# Altium PCB DSP_Expansion_Board.PcbDoc (part 1 of 3)
Units mil, origin at the board's own origin, x right, y up, seen from the top; angles counter-clockwise.
Board outline 7913.39 x 4448.82 mil, 4 copper layers (Top Layer, GND, inner signal, Bottom Layer), stack 23.78 mil thick; 392 components, 294 nets, 1167 pads, 457 vias.
Unrouted connection lines stored in the file: 108.
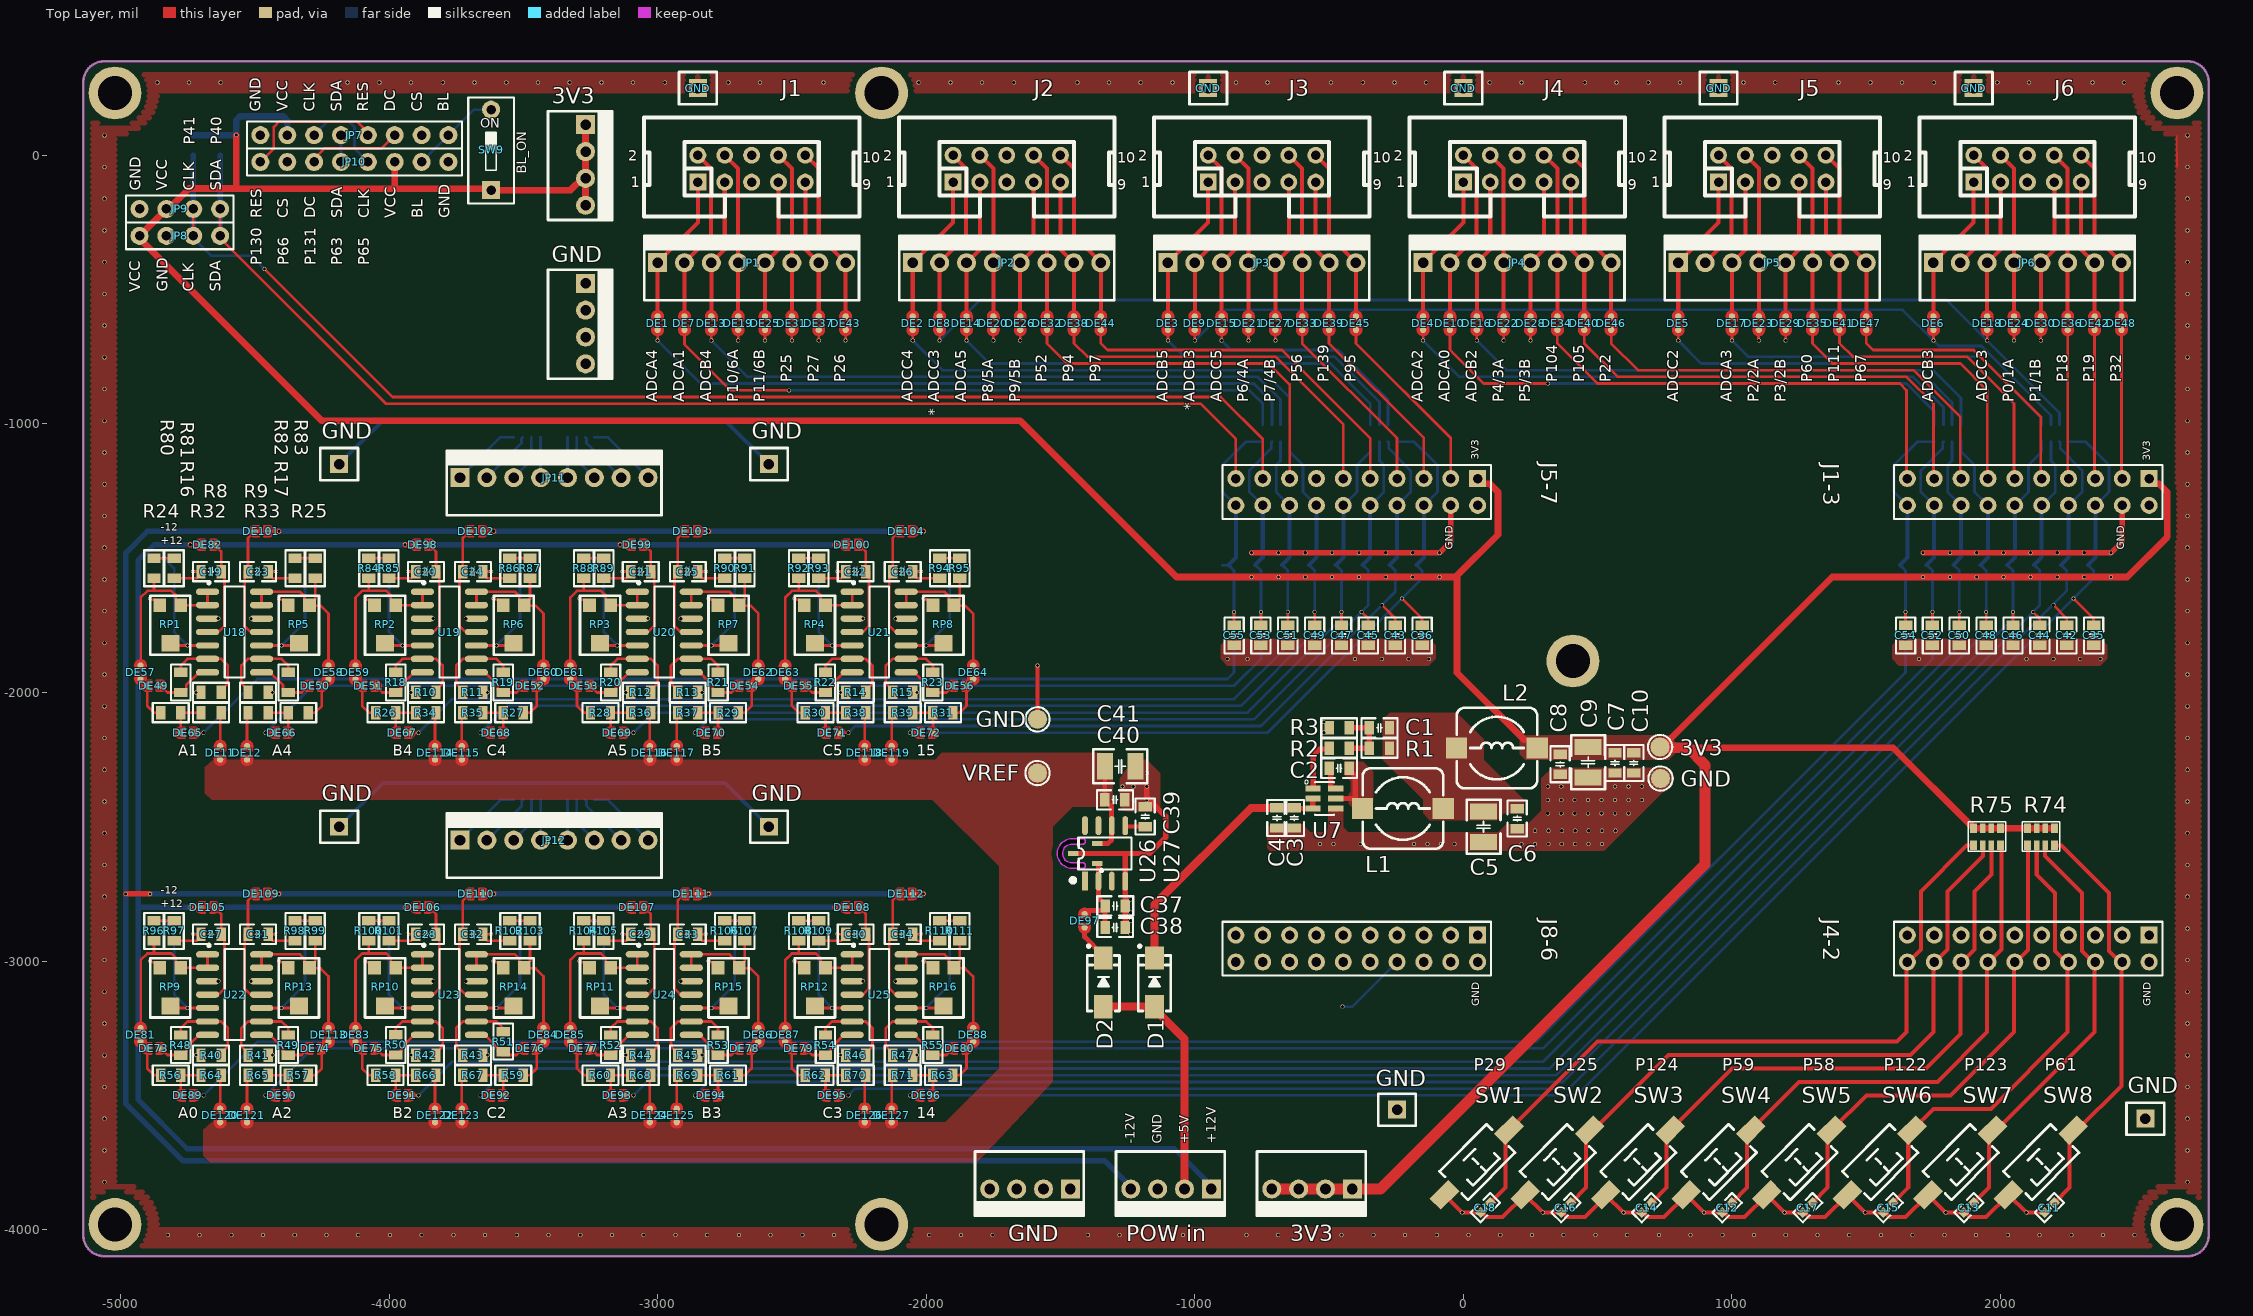
[diagram p0: Top Layer view]
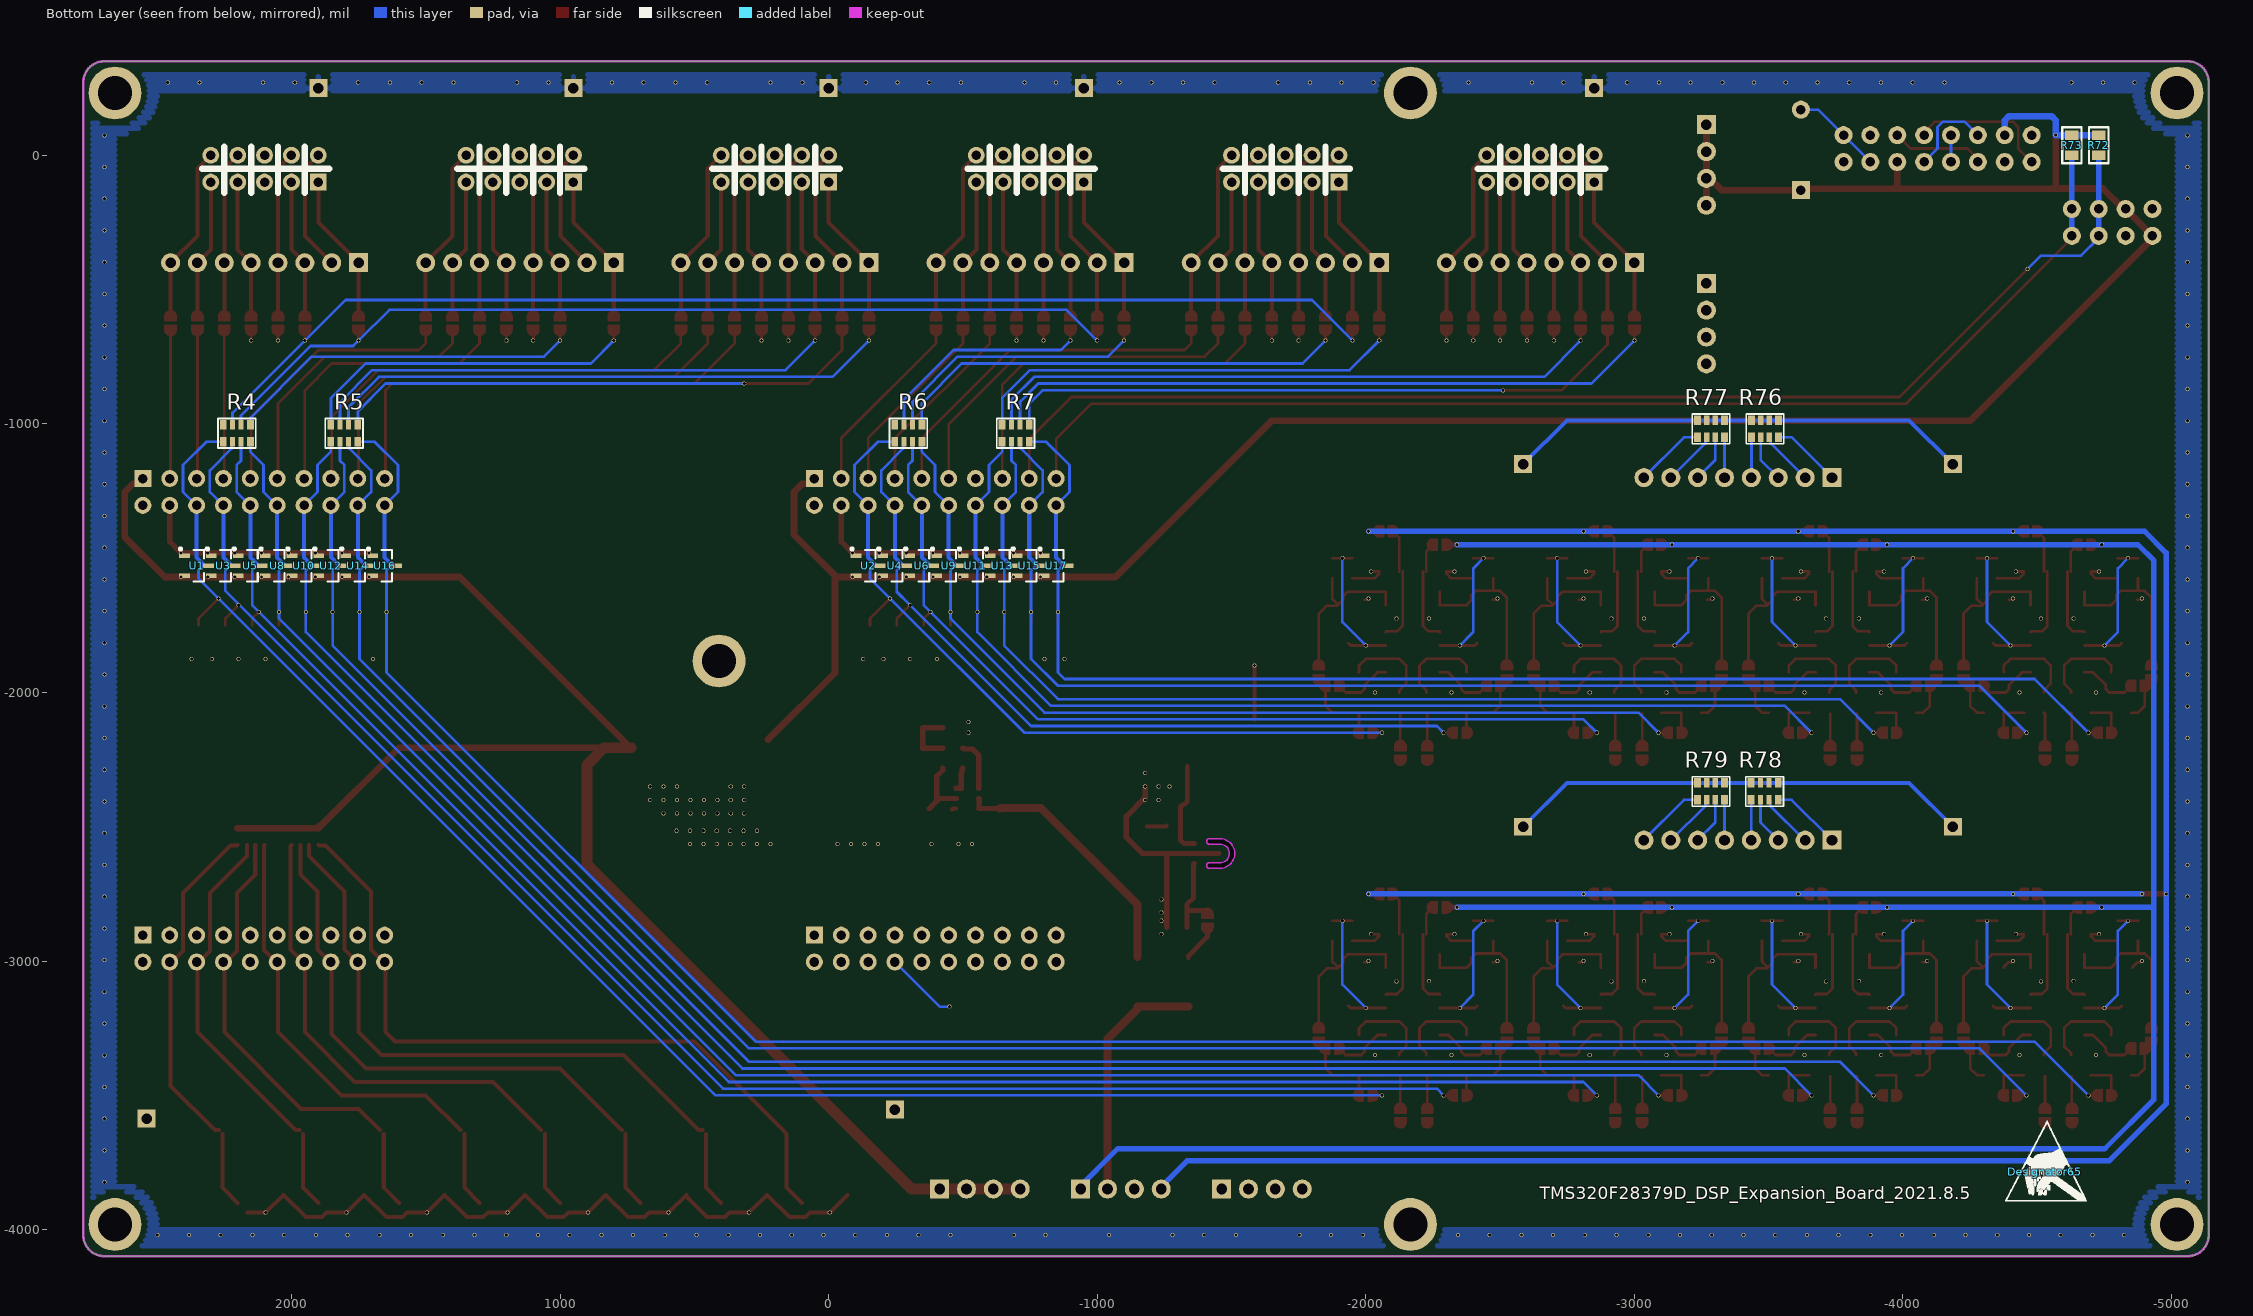
[diagram p1: Bottom Layer view, seen from below]
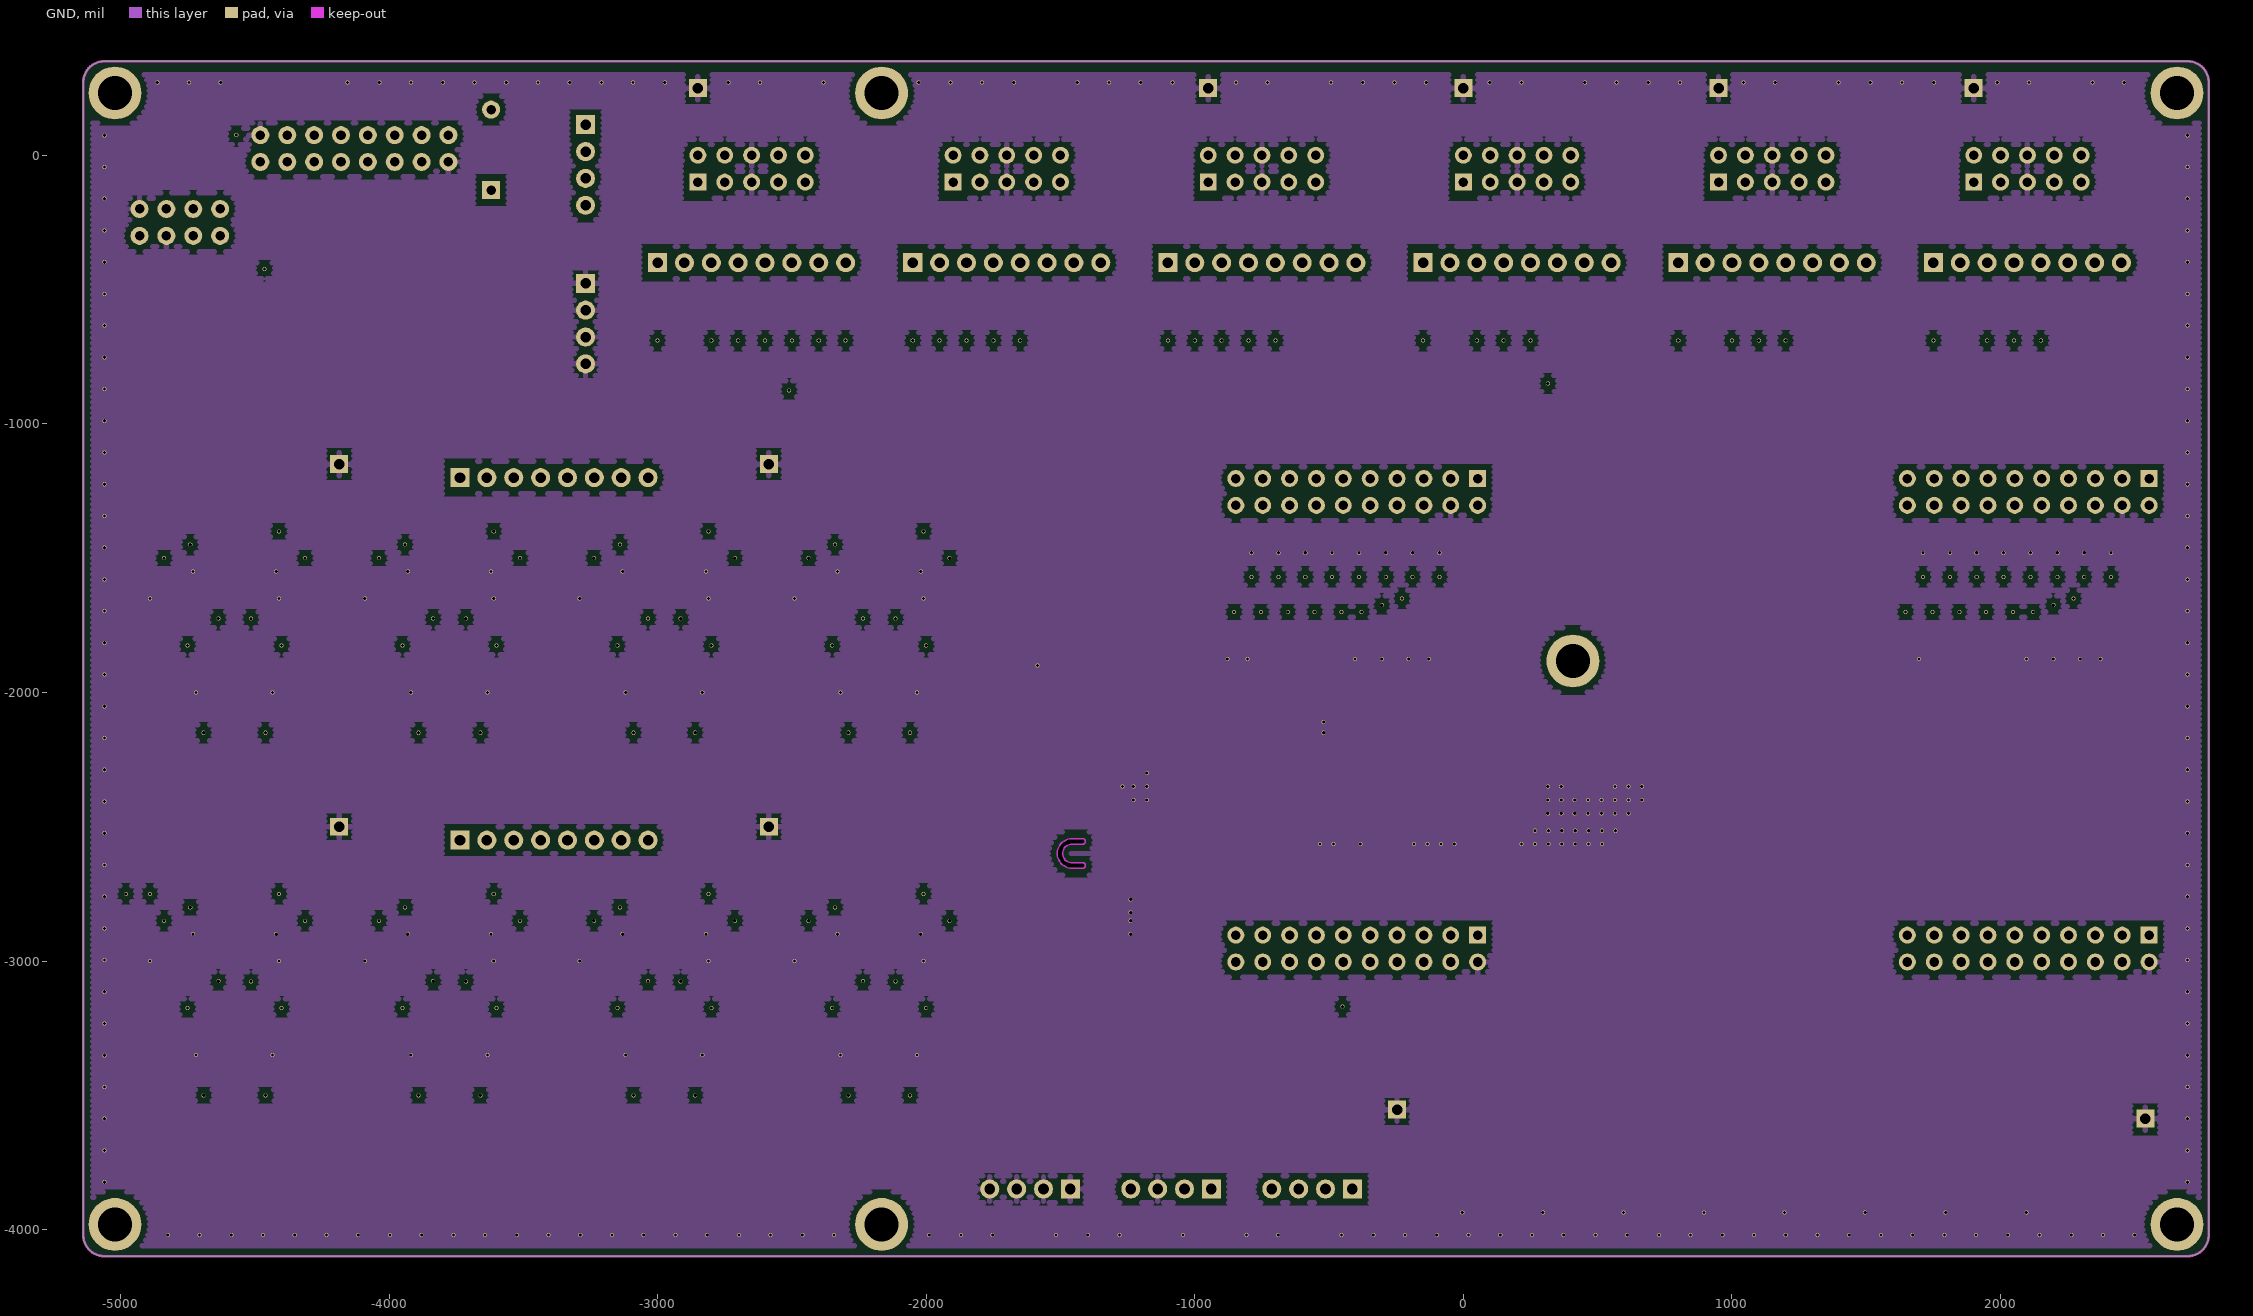
[diagram p2: GND]
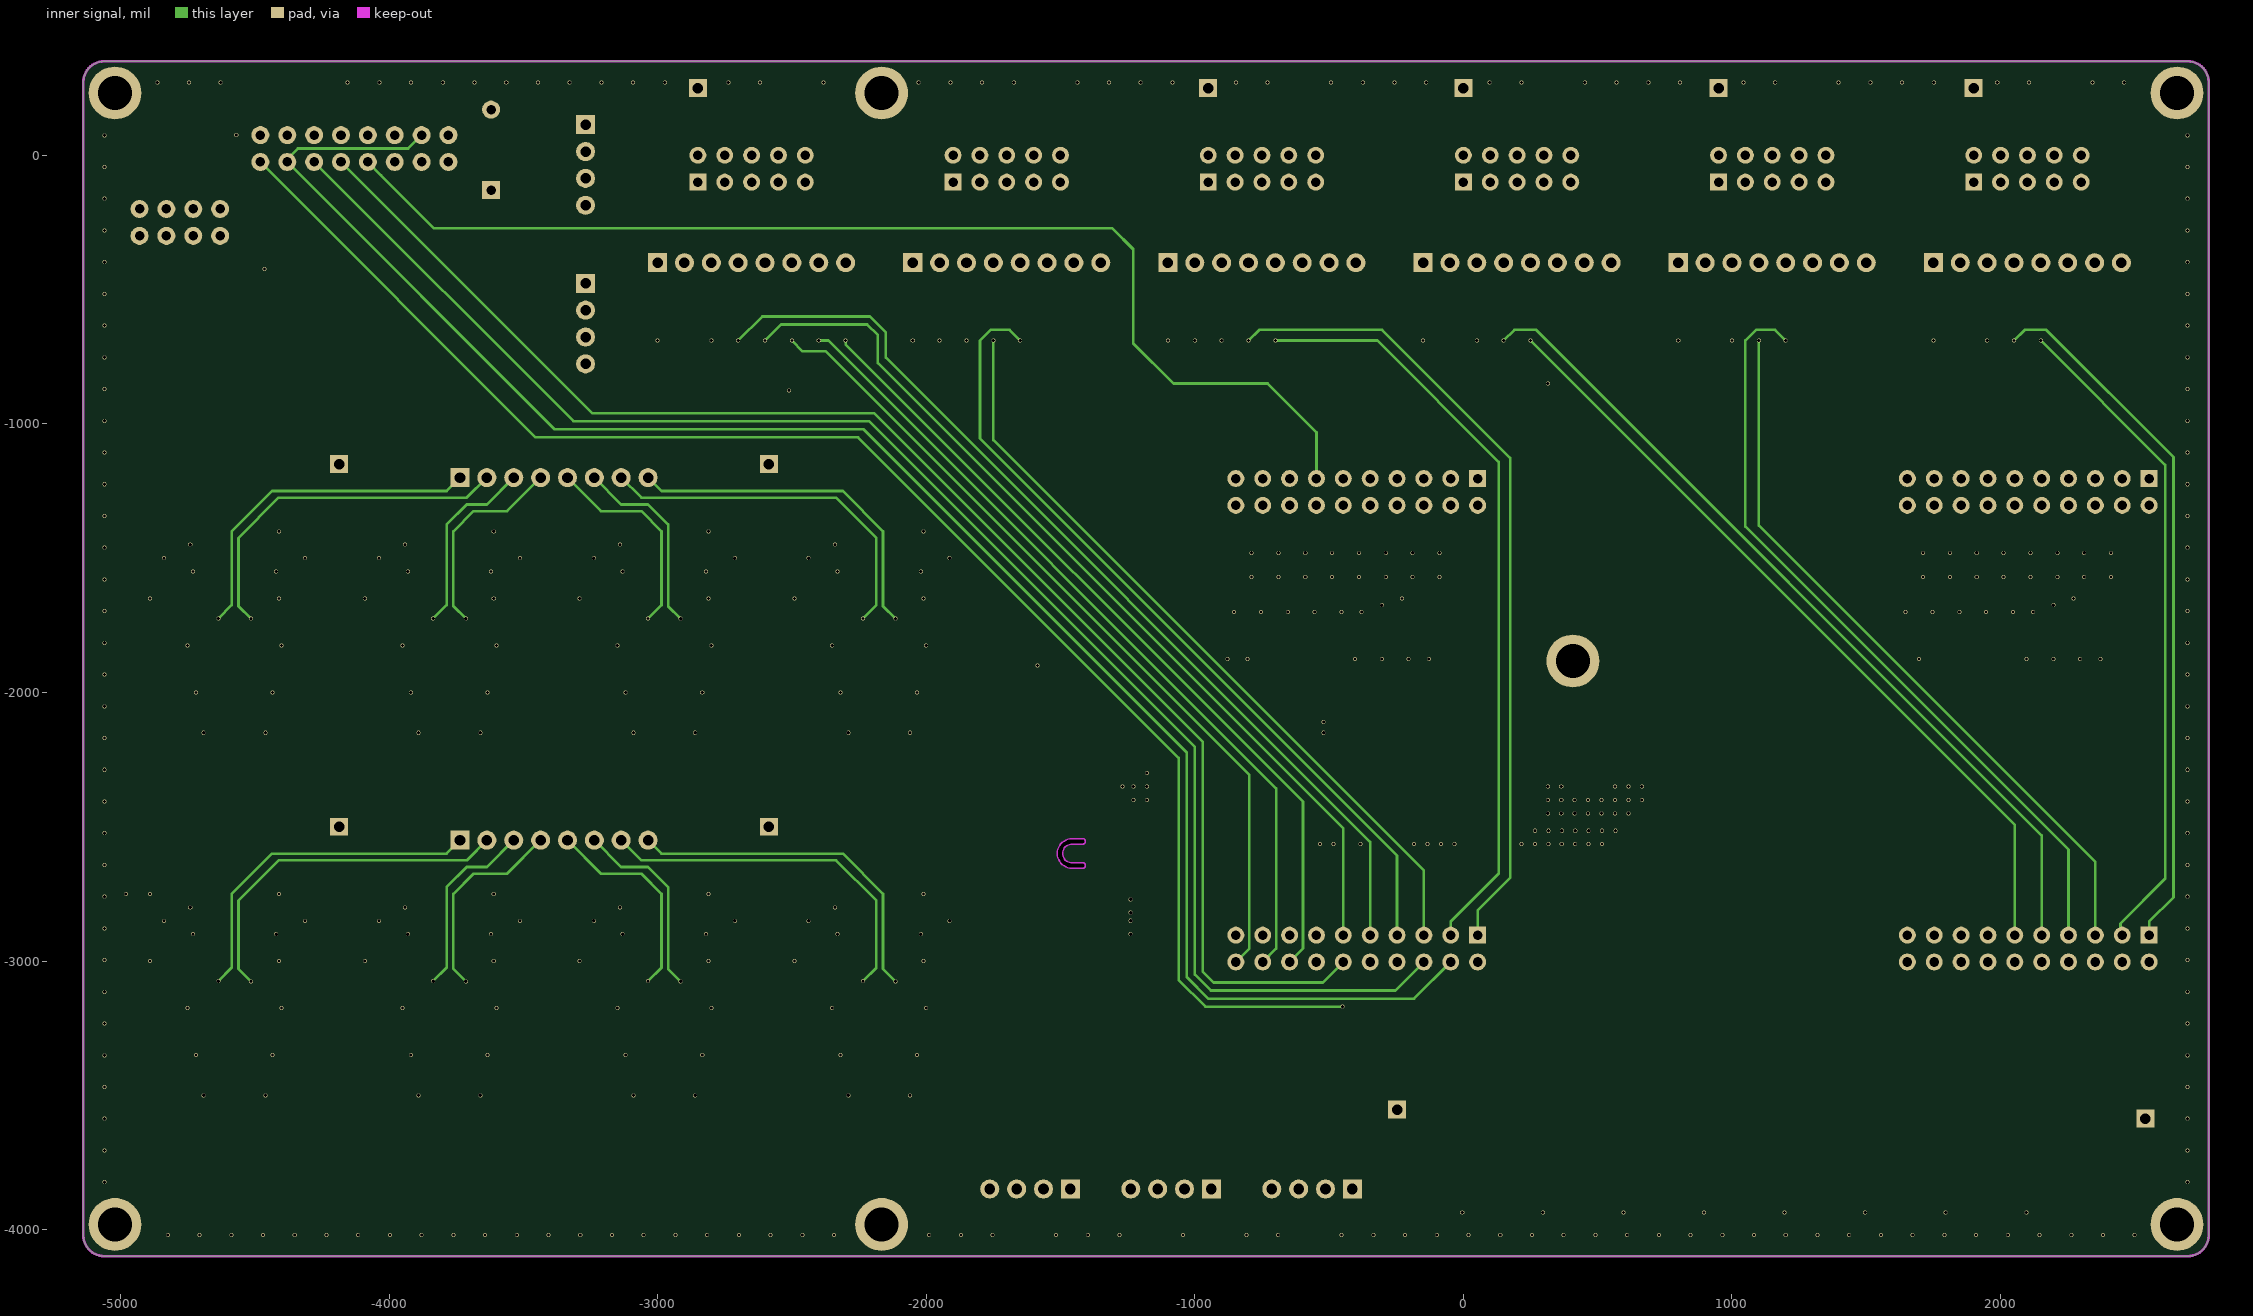
[diagram p3: inner signal]

## Layer stack, top to bottom
Top Solder: solder mask 0.3937, Solder Resist, Dk 3.5
Top Layer: signal copper 1.4173
Dielectric 2: prepreg 2.7953, PP-006, Dk 4.1
GND: signal copper 1.378
Dielectric 1: dielectric 12.5984, FR-4, Dk 4.8
inner signal: signal copper 1.378
Dielectric 3: prepreg 2.7953, PP-006, Dk 4.1
Bottom Layer: signal copper 1.4173
Bottom Solder: solder mask 0.3937, Solder Resist, Dk 3.5

## Board outline
-5059.59,-4098.82 cw(c-5059.59,-4020.08) -5138.33,-4020.08 -5138.33,271.26 cw(c-5059.59,271.26) -5059.59,350 2696.31,350 cw(c2696.31,271.26) 2775.05,271.26 2775.05,-4020.08 cw(c2696.31,-4020.08) 2696.31,-4098.82
cut-out: -1511.93,-2599.41 ccw(c-1456.93,-2599.41) -1456.93,-2654.41 -1416.93,-2654.41 ccw(c-1416.93,-2644.41) -1406.93,-2644.41 ccw(c-1416.93,-2644.41) -1416.93,-2634.41 -1456.93,-2634.41 cw(c-1456.93,-2599.41) -1491.93,-2599.41 cw(c-1456.93,-2599.41) -1456.93,-2564.41 -1416.93,-2564.41 ccw(c-1416.93,-2554.41) -1406.93,-2554.41 ccw(c-1416.93,-2554.41) -1416.93,-2544.41 -1456.93,-2544.41 ccw(c-1456.93,-2599.41)

## Design rules (kind name [scope] priority, off if disabled: settings)
Clearance Clearance_3 [All] p1: gap=10 ignorepadtopadclearanceinfootprint=TRUE except(0: Arc-Hole Track-Hole SMDPad-Hole THPad-Hole Via-Hole Text-Hole; 20: Arc-Fill Arc-Poly Track-Fill Track-Poly SMDPad-Fill SMDPad-Poly THPad-Fill THPad-Poly Via-Fill Via-Poly Fill-Fill Fill-Poly Fill-Text Fill-Hole Poly-Poly Poly-Text Poly-Hole)
Clearance Clearance_2 [All] p2: gap=20 ignorepadtopadclearanceinfootprint=TRUE except(0: Arc-Hole Track-Hole SMDPad-Hole THPad-Hole Via-Hole Text-Hole; 10: Arc-Arc Arc-Track Arc-SMDPad Arc-THPad Arc-Via Arc-Text Track-Track Track-SMDPad Track-THPad Track-Via Track-Text SMDPad-SMDPad SMDPad-THPad SMDPad-Via SMDPad-Text THPad-THPad THPad-Via THPad-Text Via-Via Via-Text Text-Text)
Clearance Clearance_1 [OnLayer('GND')] p3: gap=10 ignorepadtopadclearanceinfootprint=TRUE except(0: Arc-Hole Track-Hole SMDPad-Hole THPad-Hole Via-Hole Fill-Hole Poly-Hole Region-Hole Text-Hole; 20: Arc-Fill Arc-Poly Track-Fill Track-Poly SMDPad-Fill SMDPad-Poly THPad-Fill THPad-Poly Via-Fill Via-Poly Fill-Fill Fill-Poly Fill-Text Poly-Poly Poly-Region Poly-Text)
Clearance [All] p4: gap=10 ignorepadtopadclearanceinfootprint=TRUE except(0: Arc-Region Arc-Hole Track-Region Track-Hole SMDPad-Region SMDPad-Hole THPad-Region THPad-Hole Via-Region Via-Hole Fill-Region Poly-Region Region-Region Region-Text Region-Hole Text-Hole)
HoleSize [All] p1 off: absolutevalues=TRUE maxlimit=100 minlimit=1 maxpercent=80.000 minpercent=20.000
MinimumSolderMaskSliver [All] p1 off: minsoldermaskwidth=10
PlaneClearance [All] p1: clearance=15
PlaneConnect [All] p1: planeconnectstyle=Relief reliefexpansion=10 reliefentries=4 reliefconductorwidth=15 reliefairgap=10
PolygonConnect [All] p1: thpad.connectstyle=Relief thpad.reliefconductorwidth=20 thpad.reliefentries=4 thpad.polygonreliefangle="90 Angle" thpad.airgapwidth=10 smdpad.connectstyle=Direct smdpad.reliefconductorwidth=10 smdpad.reliefentries=4 smdpad.polygonreliefangle="90 Angle" smdpad.airgapwidth=10 via.connectstyle=Direct via.reliefconductorwidth=10 via.reliefentries=4 via.polygonreliefangle="90 Angle" via.airgapwidth=10
RoutingVias [All] p1: holewidth=28 width=50 viastyle="Through Hole" minholewidth=28 minwidth=50 maxholewidth=28 maxwidth=50
SilkToSilkClearance [All] p1 off: silktosilkclearance=10
SilkToSolderMaskClearance [IsPad] p1 off: minsilkscreentomaskgap=10 clearancetoexposedcopper=TRUE
SolderMaskExpansion [All] p1: expansion=4 istentingtop=FALSE
Width [All] p1: maxlimit=50 minlimit=8 preferedwidth=10
24 further rules are at their usual default settings.

## Components (designator, comment, footprint, x,y, rotation, side; value= is the part's Value field where it differs from the comment)
3V3 "HDR-1X4" KF2510-LI-4P -563.33,-3848.82 r180 top
3V3 "HDR-1X4" KF2510-LI-4P -3268.26,-36.22 r270 top
3V3 "TEST" "TEST 1.8" 732.1,-2203.06 r0 top
C1 "330p" "C 0805_L" -312.6,-2132.08 r0 top
C2 "104" "C 0805_L" -462.4,-2282.08 r0 top
C3 "104" "C 0805_L" -630,-2467.4 r90 top
C4 "475" "C 0805_L" -694.07,-2467.4 r90 top
C5 "10u" "C 1210_L" 75,-2500 r90 top
C6 "104" "C 0805_L" 200,-2469.68 r90 top
C7 "104" "C 0805_L" 564.42,-2262.6 r90 top
C8 "104" "C 0805_L" 360,-2267.4 r90 top
C9 "10u" "C 1210_L" 464.42,-2260 r90 top
C10 "4.7u" "C 0805_L" 634.42,-2262.6 r90 top
C11 "SW_DEBOUNCE_CAP_563" "C 0603_L" 2181.9,-3918.1 r225 top
C12 "SW_DEBOUNCE_CAP_563" "C 0603_L" 981.9,-3918.1 r225 top
C13 "SW_DEBOUNCE_CAP_563" "C 0603_L" 1881.9,-3918.1 r225 top
C14 "SW_DEBOUNCE_CAP_563" "C 0603_L" 681.9,-3918.1 r225 top
C15 "SW_DEBOUNCE_CAP_563" "C 0603_L" 1581.9,-3918.1 r225 top
C16 "SW_DEBOUNCE_CAP_563" "C 0603_L" 381.9,-3918.1 r225 top
C17 "SW_DEBOUNCE_CAP_563" "C 0603_L" 1281.9,-3918.1 r225 top
C18 "SW_DEBOUNCE_CAP_563" "C 0603_L" 81.9,-3918.1 r225 top
C19 "104" "C 0805_L" -4662.6,-1550 r0 top
C20 "104" "C 0805_L" -3862.6,-1550 r0 top
C21 "104" "C 0805_L" -3062.6,-1550 r0 top
C22 "104" "C 0805_L" -2262.6,-1550 r0 top
C23 "104" "C 0805_L" -4487.4,-1550 r180 top
C24 "104" "C 0805_L" -3687.4,-1550 r180 top
C25 "104" "C 0805_L" -2887.4,-1550 r180 top
C26 "104" "C 0805_L" -2087.4,-1550 r180 top
C27 "104" "C 0805_L" -4662.6,-2900 r0 top
C28 "104" "C 0805_L" -3862.6,-2900 r0 top
C29 "104" "C 0805_L" -3062.6,-2900 r0 top
C30 "104" "C 0805_L" -2262.6,-2900 r0 top
C31 "104" "C 0805_L" -4487.4,-2900 r180 top
C32 "104" "C 0805_L" -3687.4,-2900 r180 top
C33 "104" "C 0805_L" -2887.4,-2900 r180 top
C34 "104" "C 0805_L" -2087.4,-2900 r180 top
C35 "ADC_FLT_CAP" "C 0805_L" 2346.26,-1787.4 r90 top
C36 "ADC_FLT_CAP" "C 0805_L" -153.74,-1787.4 r90 top
C37 "475" "C 0805_L" -1296.15,-2795 r180 top
C38 "104" "C 0805_L" -1296.42,-2875 r180 top
C39 "475" "C 0805_L" -1185,-2462.4 r270 top
C40 "104" "C 0805_L" -1297.6,-2400 r180 top
C41 "106" "C 1210_L" -1277.91,-2275 r180 top
C42 "ADC_FLT_CAP" "C 0805_L" 2246.26,-1787.4 r90 top
C43 "ADC_FLT_CAP" "C 0805_L" -253.74,-1787.4 r90 top
C44 "ADC_FLT_CAP" "C 0805_L" 2146.26,-1787.4 r90 top
C45 "ADC_FLT_CAP" "C 0805_L" -353.74,-1787.4 r90 top
C46 "ADC_FLT_CAP" "C 0805_L" 2046.26,-1787.4 r90 top
C47 "ADC_FLT_CAP" "C 0805_L" -453.74,-1787.4 r90 top
C48 "ADC_FLT_CAP" "C 0805_L" 1946.26,-1787.4 r90 top
C49 "ADC_FLT_CAP" "C 0805_L" -553.74,-1787.4 r90 top
C50 "ADC_FLT_CAP" "C 0805_L" 1846.26,-1787.4 r90 top
C51 "ADC_FLT_CAP" "C 0805_L" -653.74,-1787.4 r90 top
C52 "ADC_FLT_CAP" "C 0805_L" 1746.26,-1787.4 r90 top
C53 "ADC_FLT_CAP" "C 0805_L" -753.74,-1787.4 r90 top
C54 "ADC_FLT_CAP" "C 0805_L" 1646.26,-1787.4 r90 top
C55 "ADC_FLT_CAP" "C 0805_L" -853.74,-1787.4 r90 top
D1 "SS34" SMA -1150,-3079.45 r90 top
D2 "SS34" SMA -1340,-3079.45 r90 top
DE1 "DEBUG PAD" DEBUG_B#1 -3000,-625 r90 top
DE2 "DEBUG PAD" DEBUG_B#2 -2050,-625 r90 top
DE3 "DEBUG PAD" DEBUG_B#2 -1100,-625 r90 top
DE4 "DEBUG PAD" DEBUG_B#3 -150,-625 r90 top
DE5 "DEBUG PAD" DEBUG_B#3 800,-625 r90 top
DE6 "DEBUG PAD" DEBUG_B#2 1750,-625 r90 top
DE7 "DEBUG PAD" DEBUG_B#4 -2900,-625 r90 top
DE8 "DEBUG PAD" DEBUG_B#2 -1950,-625 r90 top
DE9 "DEBUG PAD" DEBUG_B#2 -1000,-625 r90 top
DE10 "DEBUG PAD" DEBUG_B#3 -50,-625 r90 top
DE11 "DEBUG PAD" DEBUG_B#2 -4628.74,-2225 r90 top
DE12 "DEBUG PAD" DEBUG_B#5 -4528.74,-2225 r270 top
DE13 "DEBUG PAD" DEBUG_B#1 -2800,-625 r90 top
DE14 "DEBUG PAD" DEBUG_B#3 -1850,-625 r90 top
DE15 "DEBUG PAD" DEBUG_B#2 -900,-625 r90 top
DE16 "DEBUG PAD" DEBUG_B#3 50,-625 r90 top
DE17 "DEBUG PAD" DEBUG_B#3 1000,-625 r90 top
DE18 "DEBUG PAD" DEBUG_B#2 1950,-625 r90 top
DE19 "DEBUG PAD" DEBUG_B#1 -2700,-625 r90 top
DE20 "DEBUG PAD" DEBUG_B#3 -1750,-625 r90 top
DE21 "DEBUG PAD" DEBUG_B#2 -800,-625 r90 top
DE22 "DEBUG PAD" DEBUG_B#2 150,-625 r90 top
DE23 "DEBUG PAD" DEBUG_B#3 1100,-625 r90 top
DE24 "DEBUG PAD" DEBUG_B#2 2050,-625 r90 top
DE25 "DEBUG PAD" DEBUG_B#1 -2600,-625 r90 top
DE26 "DEBUG PAD" DEBUG_B#2 -1650,-625 r90 top
DE27 "DEBUG PAD" DEBUG_B#3 -700,-625 r90 top
DE28 "DEBUG PAD" DEBUG_B#3 250,-625 r90 top
DE29 "DEBUG PAD" DEBUG_B#2 1200,-625 r90 top
DE30 "DEBUG PAD" DEBUG_B#2 2150,-625 r90 top
DE31 "DEBUG PAD" DEBUG_B#1 -2500,-625 r90 top
DE32 "DEBUG PAD" DEBUG_B#3 -1550,-625 r90 top
DE33 "DEBUG PAD" DEBUG_B#3 -600,-625 r90 top
DE34 "DEBUG PAD" DEBUG_B#2 350,-625 r90 top
DE35 "DEBUG PAD" DEBUG_B#6 1300,-625 r90 top
DE36 "DEBUG PAD" DEBUG_B#3 2250,-625 r90 top
DE37 "DEBUG PAD" DEBUG_B#1 -2400,-625 r90 top
DE38 "DEBUG PAD" DEBUG_B#3 -1450,-625 r90 top
DE39 "DEBUG PAD" DEBUG_B#3 -500,-625 r90 top
DE40 "DEBUG PAD" DEBUG_B#2 450,-625 r90 top
DE41 "DEBUG PAD" DEBUG_B#3 1400,-625 r90 top
DE42 "DEBUG PAD" DEBUG_B#3 2350,-625 r90 top
DE43 "DEBUG PAD" DEBUG_B#1 -2300,-625 r90 top
DE44 "DEBUG PAD" DEBUG_B#3 -1350,-625 r90 top
DE45 "DEBUG PAD" DEBUG_B#3 -400,-625 r90 top
DE46 "DEBUG PAD" DEBUG_B#2 550,-625 r90 top
DE47 "DEBUG PAD" DEBUG_B#2 1500,-625 r90 top
DE48 "DEBUG PAD" DEBUG_B#3 2450,-625 r90 top
DE49 "DEBUG PAD" DEBUG_B#7 -4875,-1975 r0 top
DE50 "DEBUG PAD" DEBUG_B#7 -4275,-1975 r180 top
DE51 "DEBUG PAD" DEBUG_B#8 -4075,-1975 r0 top
DE52 "DEBUG PAD" DEBUG_B#8 -3475,-1975 r180 top
DE53 "DEBUG PAD" DEBUG_B#8 -3275,-1975 r0 top
DE54 "DEBUG PAD" DEBUG_B#8 -2675,-1975 r180 top
DE55 "DEBUG PAD" DEBUG_B#8 -2475,-1975 r0 top
DE56 "DEBUG PAD" DEBUG_B#8 -1875,-1975 r180 top
DE57 "DEBUG PAD" DEBUG_B#9 -4925,-1925 r270 top
DE58 "DEBUG PAD" DEBUG_B#9 -4225,-1925 r270 top
DE59 "DEBUG PAD" DEBUG_B#8 -4125,-1925 r270 top
DE60 "DEBUG PAD" DEBUG_B#8 -3425,-1925 r270 top
DE61 "DEBUG PAD" DEBUG_B#8 -3325,-1925 r270 top
DE62 "DEBUG PAD" DEBUG_B#8 -2625,-1925 r270 top
DE63 "DEBUG PAD" DEBUG_B#8 -2525,-1925 r270 top
DE64 "DEBUG PAD" DEBUG_B#8 -1825,-1925 r270 top
DE65 "DEBUG PAD" DEBUG_B#2 -4750,-2150 r180 top
DE66 "DEBUG PAD" DEBUG_B#2 -4400,-2150 r0 top
DE67 "DEBUG PAD" DEBUG_B#2 -3950,-2150 r180 top
DE68 "DEBUG PAD" DEBUG_B#2 -3600,-2150 r0 top
DE69 "DEBUG PAD" DEBUG_B#2 -3150,-2150 r180 top
DE70 "DEBUG PAD" DEBUG_B#2 -2800,-2150 r0 top
DE71 "DEBUG PAD" DEBUG_B#2 -2350,-2150 r180 top
DE72 "DEBUG PAD" DEBUG_B#2 -2000,-2150 r0 top
DE73 "DEBUG PAD" DEBUG_B#8 -4875,-3325 r0 top
DE74 "DEBUG PAD" DEBUG_B#8 -4275,-3325 r180 top
DE75 "DEBUG PAD" DEBUG_B#8 -4075,-3325 r0 top
DE76 "DEBUG PAD" DEBUG_B#8 -3475,-3325 r180 top
DE77 "DEBUG PAD" DEBUG_B#8 -3275,-3325 r0 top
DE78 "DEBUG PAD" DEBUG_B#8 -2675,-3325 r180 top
DE79 "DEBUG PAD" DEBUG_B#8 -2475,-3325 r0 top
DE80 "DEBUG PAD" DEBUG_B#8 -1875,-3325 r180 top
DE81 "DEBUG PAD" DEBUG_B#8 -4925,-3275 r270 top
DE82 "DEBUG PAD" DEBUG_B#7 -4675,-1450 r180 top
DE83 "DEBUG PAD" DEBUG_B#8 -4125,-3275 r270 top
DE84 "DEBUG PAD" DEBUG_B#8 -3425,-3275 r270 top
DE85 "DEBUG PAD" DEBUG_B#3 -3325,-3275 r270 top
DE86 "DEBUG PAD" DEBUG_B#8 -2625,-3275 r270 top
DE87 "DEBUG PAD" DEBUG_B#8 -2525,-3275 r270 top
DE88 "DEBUG PAD" DEBUG_B#8 -1825,-3275 r270 top
DE89 "DEBUG PAD" DEBUG_B#2 -4750,-3500 r180 top
DE90 "DEBUG PAD" DEBUG_B#2 -4400,-3500 r0 top
DE91 "DEBUG PAD" DEBUG_B#2 -3950,-3500 r180 top
DE92 "DEBUG PAD" DEBUG_B#2 -3600,-3500 r0 top
DE93 "DEBUG PAD" DEBUG_B#2 -3150,-3500 r180 top
DE94 "DEBUG PAD" DEBUG_B#2 -2800,-3500 r0 top
DE95 "DEBUG PAD" DEBUG_B#2 -2350,-3500 r180 top
DE96 "DEBUG PAD" DEBUG_B#2 -2000,-3500 r0 top
DE97 "DEBUG PAD" DEBUG_B#10 -1410,-2850 r90 top
DE98 "DEBUG PAD" DEBUG_B#5 -3875,-1450 r180 top
DE99 "DEBUG PAD" DEBUG_B#5 -3075,-1450 r180 top
DE100 "DEBUG PAD" DEBUG_B#11 -2275,-1450 r180 top
DE101 "DEBUG PAD" DEBUG_B#4 -4475,-1400 r0 top
DE102 "DEBUG PAD" DEBUG_B#4 -3675,-1400 r0 top
DE103 "DEBUG PAD" DEBUG_B#11 -2875,-1400 r0 top
DE104 "DEBUG PAD" DEBUG_B#11 -2075,-1400 r0 top
DE105 "DEBUG PAD" DEBUG_B#11 -4675,-2800 r180 top
DE106 "DEBUG PAD" DEBUG_B#11 -3875,-2800 r180 top
DE107 "DEBUG PAD" DEBUG_B#11 -3075,-2800 r180 top
DE108 "DEBUG PAD" DEBUG_B#11 -2275,-2800 r180 top
DE109 "DEBUG PAD" DEBUG_B#11 -4475,-2750 r0 top
DE110 "DEBUG PAD" DEBUG_B#11 -3675,-2750 r0 top
DE111 "DEBUG PAD" DEBUG_B#11 -2875,-2750 r0 top
DE112 "DEBUG PAD" DEBUG_B#11 -2075,-2750 r0 top
DE113 "DEBUG PAD" DEBUG_B#8 -4225,-3275 r90 top
DE114 "DEBUG PAD" DEBUG_B#6 -3828.74,-2225 r90 top
DE115 "DEBUG PAD" DEBUG_B#12 -3728.74,-2225 r270 top
DE116 "DEBUG PAD" DEBUG_B#13 -3028.74,-2225 r90 top
DE117 "DEBUG PAD" DEBUG_B#8 -2928.74,-2225 r270 top
DE118 "DEBUG PAD" DEBUG_B#13 -2228.74,-2225 r90 top
DE119 "DEBUG PAD" DEBUG_B#12 -2128.74,-2225 r270 top
DE120 "DEBUG PAD" DEBUG_B#13 -4628.74,-3575 r90 top
DE121 "DEBUG PAD" DEBUG_B#12 -4528.74,-3575 r270 top
DE122 "DEBUG PAD" DEBUG_B#13 -3828.74,-3575 r90 top
DE123 "DEBUG PAD" DEBUG_B#12 -3728.74,-3575 r270 top
DE124 "DEBUG PAD" DEBUG_B#13 -3028.74,-3575 r90 top
DE125 "DEBUG PAD" DEBUG_B#12 -2928.74,-3575 r270 top
DE126 "DEBUG PAD" DEBUG_B#13 -2228.74,-3575 r90 top
DE127 "DEBUG PAD" DEBUG_B#12 -2128.74,-3575 r270 top
Designator65 "Comment" ICO1 -4528.1,-3783.86 r180 bottom
GND "HDR-1X4" KF2510-LI-4P -1613.33,-3848.82 r180 top
GND "TEST TP" "TEST TP1.4_B" -247,-3553.54 r180 top
GND "HDR-1X4" KF2510-LI-4P -3268.26,-626.77 r270 top
GND "TEST TP" "TEST TP1.4_B" -2585.58,-2500 r180 top
GND "TEST TP" "TEST TP1.4_B" -2585.58,-1150 r180 top
GND "TEST TP" "TEST TP1.4_B" -950,250 r0 top
GND "TEST TP" "TEST TP1.4_B" 2538.83,-3587.01 r0 top
GND "TEST TP" "TEST TP1.4_B" 1900,250 r0 top
GND "TEST TP" "TEST TP1.4_B" 0,250 r0 top
GND "TEST TP" "TEST TP1.4_B" -4185.58,-2500 r0 top
GND "TEST" "TEST 1.8" 734.02,-2320.47 r0 top
GND "TEST TP" "TEST TP1.4_B" 950,250 r0 top
GND "TEST TP" "TEST TP1.4_B" -2850,250 r0 top
GND "TEST" "TEST 1.8" -1585.58,-2100 r0 top
GND "TEST TP" "TEST TP1.4_B" -4185.58,-1150 r0 top
J1 "Header 5X2" IDC2.54-LI-2x5P -2850,-100 r0 top
J1-3 "Header 2X10" HDR2.54-LI-2x10P 2103,-1253.54 r180 top
J2 "Header 5X2" IDC2.54-LI-2x5P -1900,-100 r0 top
J3 "Header 5X2" IDC2.54-LI-2x5P -950,-100 r0 top
J4 "Header 5X2" IDC2.54-LI-2x5P 0,-100 r0 top
J4-2 "Header 2X10" HDR2.54-LI-2x10P 2103,-2953.54 r180 top
J5 "Header 5X2" IDC2.54-LI-2x5P 950,-100 r0 top
J5-7 "Header 2X10" HDR2.54-LI-2x10P -397,-1253.54 r180 top
J6 "Header 5X2" IDC2.54-LI-2x5P 1900,-100 r0 top
J8-6 "Header 2X10" HDR2.54-LI-2x10P -397,-2953.54 r180 top
JP1 "HDR-1X8" KF2510-LI-8P -2650,-400 r0 top
JP2 "HDR-1X8" KF2510-LI-8P -1700,-400 r0 top
JP3 "HDR-1X8" KF2510-LI-8P -750,-400 r0 top
JP4 "HDR-1X8" KF2510-LI-8P 200,-400 r0 top
JP5 "HDR-1X8" KF2510-LI-8P 1150,-400 r0 top
JP6 "HDR-1X8" KF2510-LI-8P 2100,-400 r0 top
JP7 "HDR-1X8" HDR2.54-M-LI-8P -4128.74,75 r0 top
JP8 "HDR-1X4" HDR2.54-M-LI-4P -4778.74,-300 r0 top
JP9 "HDR-1X4" HDR2.54-M-LI-4P -4778.74,-200 r0 top
JP10 "HDR-1X8" HDR2.54-M-LI-8P -4128.74,-25 r0 top
JP11 "HDR-1X8" KF2510-LI-8P -3385.58,-1200 r0 top
JP12 "HDR-1X8" KF2510-LI-8P -3385.58,-2550 r0 top
L1 "10uH" CDRH74 -225,-2432.09 r0 top
L2 "47uH" CDRH74 125,-2207.09 r0 top
"POW in" "HDR-1X4" KF2510-LI-4P -1088.33,-3848.82 r180 top
R1 "75K" "R 0805_L" -312.6,-2207.08 r0 top
R2 "1K" "R 0805_L" -462.4,-2207.08 r0 top
R3 "24K" "R 0805_L" -462.4,-2132.08 r0 top
R4 "102" RCA-8P4R-0603#1 2203.4,-1035.04 r180 bottom
R5 "102" RCA-8P4R-0603#1 1803.4,-1035.04 r180 bottom
R6 "102" RCA-8P4R-0603#1 -296.6,-1035.04 r180 bottom
R7 "102" RCA-8P4R-0603#1 -696.6,-1035.04 r180 bottom
R8 "NI" "R 0805_L" -4662.6,-2000 r180 top
R9 "NI" "R 0805_L" -4487.6,-2000 r0 top
R10 "NI" "R 0805_L" -3862.4,-2000 r180 top
R11 "NI" "R 0805_L" -3687.6,-2000 r0 top
R12 "NI" "R 0805_L" -3062.4,-2000 r180 top
R13 "NI" "R 0805_L" -2887.6,-2000 r0 top
R14 "NI" "R 0805_L" -2262.4,-2000 r180 top
R15 "NI" "R 0805_L" -2087.6,-2000 r0 top
R16 "NI" "R 0805_L" -4775,-1962.6 r270 top
R17 "NI" "R 0805_L" -4375,-1962.6 r270 top
R18 "NI" "R 0805_L" -3975,-1962.6 r270 top
R19 "NI" "R 0805_L" -3575,-1962.6 r270 top
R20 "NI" "R 0805_L" -3175,-1962.6 r270 top
R21 "NI" "R 0805_L" -2775,-1962.6 r270 top
R22 "NI" "R 0805_L" -2375,-1962.6 r270 top
R23 "NI" "R 0805_L" -1975,-1962.6 r270 top
R24 "10K" "R 0805_L" -4812.4,-2075 r0 top
R25 "10K" "R 0805_L" -4337.6,-2075 r180 top
R26 "10K" "R 0805_L" -4012.6,-2075 r0 top
R27 "10K" "R 0805_L" -3537.4,-2075 r180 top
R28 "10K" "R 0805_L" -3212.6,-2075 r0 top
R29 "10K" "R 0805_L" -2737.4,-2075 r180 top
R30 "10K" "R 0805_L" -2412.4,-2075 r0 top
R31 "10K" "R 0805_L" -1937.6,-2075 r180 top
R32 "10K" "R 0805_L" -4662.6,-2075 r0 top
R33 "10K" "R 0805_L" -4487.6,-2075 r180 top
R34 "10K" "R 0805_L" -3862.6,-2075 r0 top
R35 "10K" "R 0805_L" -3687.4,-2075 r180 top
R36 "10K" "R 0805_L" -3062.4,-2075 r0 top
R37 "10K" "R 0805_L" -2887.4,-2075 r180 top
R38 "10K" "R 0805_L" -2262.6,-2075 r0 top
R39 "10K" "R 0805_L" -2087.4,-2075 r180 top
R40 "NI" "R 0805_L" -4662.6,-3350 r180 top
R41 "NI" "R 0805_L" -4487.4,-3350 r0 top
R42 "NI" "R 0805_L" -3862.4,-3350 r180 top
R43 "NI" "R 0805_L" -3687.4,-3350 r0 top
R44 "NI" "R 0805_L" -3062.6,-3350 r180 top
R45 "NI" "R 0805_L" -2887.4,-3350 r0 top
R46 "NI" "R 0805_L" -2262.6,-3350 r180 top
R47 "NI" "R 0805_L" -2087.6,-3350 r0 top
R48 "NI" "R 0805_L" -4775,-3312.6 r270 top
R49 "NI" "R 0805_L" -4375,-3312.6 r270 top
R50 "NI" "R 0805_L" -3975,-3312.4 r270 top
R51 "NI" "R 0805_L" -3575,-3300 r270 top
R52 "NI" "R 0805_L" -3175,-3312.6 r270 top
R53 "NI" "R 0805_L" -2775,-3312.6 r270 top
R54 "NI" "R 0805_L" -2375,-3312.6 r270 top
R55 "NI" "R 0805_L" -1975,-3312.6 r270 top
R56 "10K" "R 0805_L" -4812.6,-3425 r0 top
R57 "10K" "R 0805_L" -4337.6,-3425 r180 top
R58 "10K" "R 0805_L" -4012.6,-3425 r0 top
R59 "10K" "R 0805_L" -3537.6,-3425 r180 top
R60 "10K" "R 0805_L" -3212.6,-3425 r0 top
R61 "10K" "R 0805_L" -2737.6,-3425 r180 top
R62 "10K" "R 0805_L" -2412.6,-3425 r0 top
R63 "10K" "R 0805_L" -1937.6,-3425 r180 top
R64 "10K" "R 0805_L" -4662.6,-3425 r0 top
R65 "10K" "R 0805_L" -4487.4,-3425 r180 top
R66 "10K" "R 0805_L" -3862.6,-3425 r0 top
R67 "10K" "R 0805_L" -3687.6,-3425 r180 top
R68 "10K" "R 0805_L" -3062.6,-3425 r0 top
R69 "10K" "R 0805_L" -2887.6,-3425 r180 top
R70 "10K" "R 0805_L" -2262.4,-3425 r0 top
R71 "10K" "R 0805_L" -2087.4,-3425 r180 top
R72 "4.7K" "R 0805_L" -4728.74,37.4 r90 bottom
R73 "4.7K" "R 0805_L" -4628.74,37.4 r90 bottom
R74 "102" RCA-8P4R-0603#1 2150.39,-2536.8 r180 top
R75 "102" RCA-8P4R-0603#1 1949.61,-2536.8 r180 top
R76 "104" RCA-8P4R-0603#2 -3485.97,-1018.5 r0 bottom
R77 "104" RCA-8P4R-0603#2 -3285.18,-1018.5 r0 bottom
R78 "104" RCA-8P4R-0603#2 -3485.18,-2368.5 r0 bottom
R79 "104" RCA-8P4R-0603#2 -3285.18,-2368.5 r0 bottom
R80 "NI" "R 0805_L" -4875,-1537.6 r270 top
R81 "NI" "R 0805_L" -4800,-1537.6 r90 top
R82 "NI" "R 0805_L" -4350,-1537.6 r90 top
R83 "NI" "R 0805_L" -4275,-1537.6 r270 top
R84 "NI" "R 0805_L" -4075,-1537.6 r270 top
R85 "NI" "R 0805_L" -4000,-1537.6 r90 top
R86 "NI" "R 0805_L" -3550,-1537.6 r90 top
R87 "NI" "R 0805_L" -3475,-1537.6 r270 top
R88 "NI" "R 0805_L" -3275,-1537.6 r270 top
R89 "NI" "R 0805_L" -3200,-1537.6 r90 top
R90 "NI" "R 0805_L" -2750,-1537.6 r90 top
R91 "NI" "R 0805_L" -2675,-1537.6 r270 top
R92 "NI" "R 0805_L" -2475,-1537.6 r270 top
R93 "NI" "R 0805_L" -2400,-1537.6 r90 top
R94 "NI" "R 0805_L" -1950,-1537.6 r90 top
R95 "NI" "R 0805_L" -1875,-1537.6 r270 top
R96 "NI" "R 0805_L" -4875,-2887.6 r270 top
R97 "NI" "R 0805_L" -4800,-2887.6 r90 top
R98 "NI" "R 0805_L" -4350,-2887.6 r90 top
R99 "NI" "R 0805_L" -4275,-2887.6 r270 top
R100 "NI" "R 0805_L" -4075,-2887.6 r270 top
R101 "NI" "R 0805_L" -4000,-2887.6 r90 top
R102 "NI" "R 0805_L" -3550,-2887.6 r90 top
R103 "NI" "R 0805_L" -3475,-2887.6 r270 top
R104 "NI" "R 0805_L" -3275,-2887.6 r270 top
R105 "NI" "R 0805_L" -3200,-2887.6 r90 top
R106 "NI" "R 0805_L" -2750,-2887.6 r90 top
R107 "NI" "R 0805_L" -2675,-2887.6 r270 top
R108 "NI" "R 0805_L" -2475,-2887.6 r270 top
R109 "NI" "R 0805_L" -2400,-2887.6 r90 top
R110 "NI" "R 0805_L" -1950,-2887.6 r90 top
R111 "NI" "R 0805_L" -1875,-2887.6 r270 top
RP1 "10K" 3303W -4814.37,-1745.87 r180 top
RP2 "10K" 3303W -4014.37,-1745.87 r180 top
RP3 "10K" 3303W -3214.37,-1745.87 r180 top
RP4 "10K" 3303W -2414.37,-1745.87 r180 top
RP5 "10K" 3303W -4335.63,-1745.87 r180 top
RP6 "10K" 3303W -3535.63,-1745.87 r180 top
RP7 "10K" 3303W -2735.63,-1745.87 r180 top
RP8 "10K" 3303W -1935.63,-1745.87 r180 top
RP9 "10K" 3303W -4814.37,-3095.87 r180 top
RP10 "10K" 3303W -4014.37,-3095.87 r180 top
RP11 "10K" 3303W -3214.37,-3095.87 r180 top
RP12 "10K" 3303W -2414.37,-3095.87 r180 top
RP13 "10K" 3303W -4335.63,-3095.87 r180 top
RP14 "10K" 3303W -3535.63,-3095.87 r180 top
RP15 "10K" 3303W -2735.63,-3095.87 r180 top
RP16 "10K" 3303W -1935.63,-3095.87 r180 top
SW1 "3x6x5" "TSW SMD-3*6*4.3" 50,-3750 r225 top
SW2 "3x6x5" "TSW SMD-3*6*4.3" 350,-3750 r225 top
SW3 "3x6x5" "TSW SMD-3*6*4.3" 650,-3750 r225 top
SW4 "3x6x5" "TSW SMD-3*6*4.3" 950,-3750 r225 top
SW5 "3x6x5" "TSW SMD-3*6*4.3" 1250,-3750 r225 top
SW6 "3x6x5" "TSW SMD-3*6*4.3" 1550,-3750 r225 top
SW7 "3x6x5" "TSW SMD-3*6*4.3" 1850,-3750 r225 top
SW8 "3x6x5" "TSW SMD-3*6*4.3" 2150,-3750 r225 top
SW9 "SW-1P" "CSW DIP-1P" -3620,20 r0 top
U1 "BAT54S" SOT23-3L 2353,-1528.54 r270 bottom
U2 "BAT54S" SOT23-3L -147,-1528.54 r270 bottom
U3 "BAT54S" SOT23-3L 2253,-1528.54 r270 bottom
U4 "BAT54S" SOT23-3L -247,-1528.54 r270 bottom
U5 "BAT54S" SOT23-3L 2153,-1528.54 r270 bottom
U6 "BAT54S" SOT23-3L -347,-1528.54 r270 bottom
U7 "SCT2320" SOT23-6 -517.32,-2394.69 r90 top
U8 "BAT54S" SOT23-3L 2053,-1528.54 r270 bottom
U9 "BAT54S" SOT23-3L -447,-1528.54 r270 bottom
U10 "BAT54S" SOT23-3L 1953,-1528.54 r270 bottom
U11 "BAT54S" SOT23-3L -547,-1528.54 r270 bottom
U12 "BAT54S" SOT23-3L 1853,-1528.54 r270 bottom
U13 "BAT54S" SOT23-3L -647,-1528.54 r270 bottom
U14 "BAT54S" SOT23-3L 1753,-1528.54 r270 bottom
U15 "BAT54S" SOT23-3L -747,-1528.54 r270 bottom
U16 "BAT54S" SOT23-3L 1653,-1528.54 r270 bottom
U17 "BAT54S" SOT23-3L -847,-1528.54 r270 bottom
U18 "LM324" SOIC-14 -4575,-1775 r0 top
U19 "LM324" SOIC-14 -3775,-1775 r0 top
U20 "LM324" SOIC-14 -2975,-1775 r0 top
U21 "LM324" SOIC-14 -2175,-1775 r0 top
U22 "LM324" SOIC-14 -4575,-3125 r0 top
U23 "LM324" SOIC-14 -3775,-3125 r0 top
U24 "LM324" SOIC-14 -2975,-3125 r0 top
U25 "LM324" SOIC-14 -2175,-3125 r0 top
U26 "REF5030" SOP8_N -1333.82,-2599.41 r90 top
U27 "REF3030" SOT23-3L -1407.64,-2599.41 r90 top
VREF "TEST" "TEST 1.8" -1585.58,-2300 r90 top

## Footprints (in the part's own frame and the unit in brackets; to place one, negate y for a bottom-side part, rotate by r counter-clockwise, add the part's x,y. Pads: shape width x height; smd on the part's side, far side on the other; paste and mask are expansions set on the pad)
3303W [mm] "3.5*3.1*1.5mm"
  rect 1.2x1.3 smd: 1(-1,-1.8) 3(1,-1.8)
  rect 1.7x1.6 smd: 2(0,1.8)
  silkscreen extent -1.9,-2.7 1.9,2.9, body extent -1.55,-2.06 1.55,2.05, height 1.45
"C 0603_L" [mil] "无极性贴片电容"
  rect 30x30 smd: 1(-25.59,0) 2(25.59,0)
  silkscreen extent -51,-26 51,26, body extent -31,-16 31,16, height 32
"C 0805_L" [mil] "无极性贴片电容"
  rect 35x50 smd: 1(-37.4,0) 2(37.4,0)
  silkscreen extent -67,-36 67,36, body extent -39,-24 39,24, height 20
"C 1210_L" [mil] "无极性贴片电容"
  rect 60x100 smd: 1(-57.09,0) 2(57.09,0)
  silkscreen extent -100,-63 100,63, body extent -63,-51 63,51, height 60
CDRH74 [mm] "7.3*7.3*4.5mm（长宽高）"
  rect 2x2 smd: 1(-3.81,0) 2(3.81,0)
  silkscreen extent -3.81,-3.81 3.81,3.81, body extent -3.65,-3.65 3.65,3.65, height 4.5
"CSW DIP-1P" [mm] "4.1*9.9*7mm"
  rect 1.7x1.7 hole 0.9: 1(0,-3.81)
  round 1.7 hole 0.9: 2(0,3.81)
  silkscreen extent -2.16,-5.08 2.16,4.95, body extent -2.05,-4.95 2.05,4.95, height 6.65
DEBUG_B#1 [mm] "调试断点焊盘"
  round 0.6 smd paste-0.6: 1(-0.635,0) 2(0.635,0)
  Top Layer region: 0.254,-0.508 0.762,-0.508 0.908,-0.479 1.031,-0.396 1.114,-0.273 1.143,-0.127 1.143,-0.127 1.143,0 1.104,0.194 0.994,0.359 0.829,0.469 0.635,0.508 0.635,0.508 0.254,0.508
  Top Layer region: -0.254,0.508 -0.762,0.508 -0.908,0.479 -1.031,0.396 -1.114,0.273 -1.143,0.127 -1.143,0.127 -1.143,0 -1.104,-0.194 -0.994,-0.359 -0.829,-0.469 -0.635,-0.508 -0.635,-0.508 -0.254,-0.508
  Top Layer lines w0.203: -0.635,0.508 ccw(c-0.635,0) -1.143,0 ccw(c-0.635,0) -0.635,-0.508 -0.254,-0.508 -0.254,0 -0.254,0.508 -0.635,0.508 ; 0.254,0.508 0.254,0 0.254,-0.508 0.635,-0.508 ccw(c0.635,0) 1.143,0 ccw(c0.635,0) 0.635,0.508 0.254,0.508
DEBUG_B#2 [mm] "调试断点焊盘"
  round 0.6 smd paste-0.6: 1(-0.635,0) 2(0.635,0)
  Top Layer region: 0.254,-0.508 0.762,-0.508 0.908,-0.479 1.031,-0.396 1.114,-0.273 1.143,-0.127 1.143,-0.127 1.143,0 1.104,0.194 0.994,0.359 0.829,0.469 0.635,0.508 0.635,0.508 0.254,0.508
  Top Layer region: -0.254,0.508 -0.762,0.508 -0.908,0.479 -1.031,0.396 -1.114,0.273 -1.143,0.127 -1.143,0.127 -1.143,0 -1.104,-0.194 -0.994,-0.359 -0.829,-0.469 -0.635,-0.508 -0.635,-0.508 -0.254,-0.508
  Top Layer lines w0.203: -0.635,0.508 ccw(c-0.635,0) -1.143,0 ccw(c-0.635,0) -0.635,-0.508 -0.254,-0.508 -0.254,0 -0.254,0.508 -0.635,0.508 ; 0.254,0.508 0.254,-0.508 0.635,-0.508 ccw(c0.635,0) 0.635,0.508 0.254,0.508
DEBUG_B#3 [mm] "调试断点焊盘"
  round 0.6 smd paste-0.6: 1(-0.635,0) 2(0.635,0)
  Top Layer region: 0.254,-0.508 0.762,-0.508 0.908,-0.479 1.031,-0.396 1.114,-0.273 1.143,-0.127 1.143,-0.127 1.143,0 1.104,0.194 0.994,0.359 0.829,0.469 0.635,0.508 0.635,0.508 0.254,0.508
  Top Layer region: -0.254,0.508 -0.762,0.508 -0.908,0.479 -1.031,0.396 -1.114,0.273 -1.143,0.127 -1.143,0.127 -1.143,0 -1.104,-0.194 -0.994,-0.359 -0.829,-0.469 -0.635,-0.508 -0.635,-0.508 -0.254,-0.508
  Top Layer lines w0.203: -0.635,0.508 ccw(c-0.635,0) -1.143,0 ccw(c-0.635,0) -0.635,-0.508 -0.254,-0.508 -0.254,0.508 -0.635,0.508 ; 0.254,0.508 0.254,-0.508 0.635,-0.508 ccw(c0.635,0) 0.635,0.508 0.254,0.508
DEBUG_B#4 [mm] "调试断点焊盘"
  round 0.6 smd paste-0.6: 1(-0.635,0) 2(0.635,0)
  Top Layer region: 0.254,-0.508 0.762,-0.508 0.908,-0.479 1.031,-0.396 1.114,-0.273 1.143,-0.127 1.143,-0.127 1.143,0 1.104,0.194 0.994,0.359 0.829,0.469 0.635,0.508 0.635,0.508 0.254,0.508
  Top Layer region: -0.254,0.508 -0.762,0.508 -0.908,0.479 -1.031,0.396 -1.114,0.273 -1.143,0.127 -1.143,0.127 -1.143,0 -1.104,-0.194 -0.994,-0.359 -0.829,-0.469 -0.635,-0.508 -0.635,-0.508 -0.254,-0.508
  Top Layer lines w0.203: -0.635,0.508 ccw(c-0.635,0) -1.143,0 ccw(c-0.635,0) -0.635,-0.508 -0.254,-0.508 -0.254,0.508 -0.635,0.508 ; 0.254,0.508 0.254,0 0.254,-0.508 0.635,-0.508 ccw(c0.635,0) 1.143,0 ccw(c0.635,0) 0.635,0.508 0.254,0.508
DEBUG_B#5 [mm] "调试断点焊盘"
  round 0.6 smd paste-0.6: 1(-0.635,0) 2(0.635,0)
  Top Layer region: 0.254,-0.508 0.762,-0.508 0.908,-0.479 1.031,-0.396 1.114,-0.273 1.143,-0.127 1.143,-0.127 1.143,0 1.104,0.194 0.994,0.359 0.829,0.469 0.635,0.508 0.635,0.508 0.254,0.508
  Top Layer region: -0.254,0.508 -0.762,0.508 -0.908,0.479 -1.031,0.396 -1.114,0.273 -1.143,0.127 -1.143,0.127 -1.143,0 -1.104,-0.194 -0.994,-0.359 -0.829,-0.469 -0.635,-0.508 -0.635,-0.508 -0.254,-0.508
  Top Layer lines w0.203: 0.635,-0.508 ccw(c0.635,0) 0.635,0.508 0.254,0.508 0.254,0 0.254,-0.508 0.635,-0.508 ; -0.254,-0.508 -0.635,-0.508 cw(c-0.635,0) -1.143,0 cw(c-0.635,0) -0.635,0.508 -0.254,0.508 -0.254,-0.508
DEBUG_B#6 [mm] "调试断点焊盘"
  round 0.6 smd paste-0.6: 1(-0.635,0) 2(0.635,0)
  Top Layer region: 0.254,-0.508 0.762,-0.508 0.908,-0.479 1.031,-0.396 1.114,-0.273 1.143,-0.127 1.143,-0.127 1.143,0 1.104,0.194 0.994,0.359 0.829,0.469 0.635,0.508 0.635,0.508 0.254,0.508
  Top Layer region: -0.254,0.508 -0.762,0.508 -0.908,0.479 -1.031,0.396 -1.114,0.273 -1.143,0.127 -1.143,0.127 -1.143,0 -1.104,-0.194 -0.994,-0.359 -0.829,-0.469 -0.635,-0.508 -0.635,-0.508 -0.254,-0.508
  Top Layer lines w0.203: -0.635,0.508 ccw(c-0.635,0) -1.143,0 ccw(c-0.635,0) -0.994,-0.359 ccw(c-0.635,0) -0.635,-0.508 -0.254,-0.508 -0.254,0 -0.254,0.508 -0.635,0.508 ; 0.254,0.508 0.254,-0.508 0.635,-0.508 ccw(c0.635,0) 0.635,0.508 0.254,0.508
DEBUG_B#7 [mm] "调试断点焊盘"
  round 0.6 smd paste-0.6: 1(-0.635,0) 2(0.635,0)
  Top Layer region: 0.254,-0.508 0.762,-0.508 0.908,-0.479 1.031,-0.396 1.114,-0.273 1.143,-0.127 1.143,-0.127 1.143,0 1.104,0.194 0.994,0.359 0.829,0.469 0.635,0.508 0.635,0.508 0.254,0.508
  Top Layer region: -0.254,0.508 -0.762,0.508 -0.908,0.479 -1.031,0.396 -1.114,0.273 -1.143,0.127 -1.143,0.127 -1.143,0 -1.104,-0.194 -0.994,-0.359 -0.829,-0.469 -0.635,-0.508 -0.635,-0.508 -0.254,-0.508
  Top Layer lines w0.203: -1.121,0.149 ccw(c-0.635,0) -0.635,-0.508 -0.254,-0.508 -0.254,0.508 -0.635,0.508 ccw(c-0.635,0) -0.784,0.486 ccw(c-0.635,0) -1.121,0.149 ; 0.254,-0.508 0.635,-0.508 ccw(c0.635,0) 0.994,-0.359 ccw(c0.635,0) 0.635,0.508 0.254,0.508 0.254,-0.508
DEBUG_B#8 [mm] "调试断点焊盘"
  round 0.6 smd paste-0.6: 1(-0.635,0) 2(0.635,0)
  Top Layer region: 0.254,-0.508 0.762,-0.508 0.908,-0.479 1.031,-0.396 1.114,-0.273 1.143,-0.127 1.143,-0.127 1.143,0 1.104,0.194 0.994,0.359 0.829,0.469 0.635,0.508 0.635,0.508 0.254,0.508
  Top Layer region: -0.254,0.508 -0.762,0.508 -0.908,0.479 -1.031,0.396 -1.114,0.273 -1.143,0.127 -1.143,0.127 -1.143,0 -1.104,-0.194 -0.994,-0.359 -0.829,-0.469 -0.635,-0.508 -0.635,-0.508 -0.254,-0.508
  Top Layer lines w0.203: -0.635,-0.508 cw(c-0.635,0) -0.635,0.508 -0.254,0.508 -0.254,-0.508 -0.635,-0.508 ; 0.254,-0.508 0.254,0.508 0.635,0.508 cw(c0.635,0) 0.635,-0.508 0.254,-0.508
DEBUG_B#9 [mm] "调试断点焊盘"
  round 0.6 smd paste-0.6: 1(-0.635,0) 2(0.635,0)
  Top Layer region: 0.254,-0.508 0.762,-0.508 0.908,-0.479 1.031,-0.396 1.114,-0.273 1.143,-0.127 1.143,-0.127 1.143,0 1.104,0.194 0.994,0.359 0.829,0.469 0.635,0.508 0.635,0.508 0.254,0.508
  Top Layer region: -0.254,0.508 -0.762,0.508 -0.908,0.479 -1.031,0.396 -1.114,0.273 -1.143,0.127 -1.143,0.127 -1.143,0 -1.104,-0.194 -0.994,-0.359 -0.829,-0.469 -0.635,-0.508 -0.635,-0.508 -0.254,-0.508
  Top Layer lines w0.203: 0.635,-0.508 ccw(c0.635,0) 1.121,0.149 ccw(c0.635,0) 0.784,0.486 ccw(c0.635,0) 0.635,0.508 0.254,0.508 0.254,-0.508 0.635,-0.508 ; -0.254,-0.508 -0.635,-0.508 cw(c-0.635,0) -1.143,0 cw(c-0.635,0) -0.635,0.508 -0.254,0.508 -0.254,-0.508
DEBUG_B#10 [mm] "调试断点焊盘"
  round 0.6 smd paste-0.6: 1(-0.635,0) 2(0.635,0)
  Top Layer region: 0.254,-0.508 0.762,-0.508 0.908,-0.479 1.031,-0.396 1.114,-0.273 1.143,-0.127 1.143,-0.127 1.143,0 1.104,0.194 0.994,0.359 0.829,0.469 0.635,0.508 0.635,0.508 0.254,0.508
  Top Layer region: -0.254,0.508 -0.762,0.508 -0.908,0.479 -1.031,0.396 -1.114,0.273 -1.143,0.127 -1.143,0.127 -1.143,0 -1.104,-0.194 -0.994,-0.359 -0.829,-0.469 -0.635,-0.508 -0.635,-0.508 -0.254,-0.508
  Top Layer lines w0.203: -0.635,0.508 ccw(c-0.635,0) -1.143,0 ccw(c-0.635,0) -0.635,-0.508 -0.254,-0.508 -0.254,0 -0.254,0.508 -0.635,0.508 ; 0.254,0.508 0.635,0.508 cw(c0.635,0) 0.984,-0.369 cw(c0.635,0) 0.762,-0.492 cw(c0.635,0) 0.635,-0.508 0.254,-0.508 0.254,0 0.254,0.508
DEBUG_B#11 [mm] "调试断点焊盘"
  round 0.6 smd paste-0.6: 1(-0.635,0) 2(0.635,0)
  Top Layer region: 0.254,-0.508 0.762,-0.508 0.908,-0.479 1.031,-0.396 1.114,-0.273 1.143,-0.127 1.143,-0.127 1.143,0 1.104,0.194 0.994,0.359 0.829,0.469 0.635,0.508 0.635,0.508 0.254,0.508
  Top Layer region: -0.254,0.508 -0.762,0.508 -0.908,0.479 -1.031,0.396 -1.114,0.273 -1.143,0.127 -1.143,0.127 -1.143,0 -1.104,-0.194 -0.994,-0.359 -0.829,-0.469 -0.635,-0.508 -0.635,-0.508 -0.254,-0.508
  Top Layer lines w0.203: 1.143,0 ccw(c0.635,0) 0.635,0.508 0.254,0.508 0.254,0 0.254,-0.508 0.635,-0.508 ccw(c0.635,0) 1.143,0 ; -0.254,0.508 -0.635,0.508 ccw(c-0.635,0) -0.635,-0.508 -0.254,-0.508 -0.254,0.508
DEBUG_B#12 [mm] "调试断点焊盘"
  round 0.6 smd paste-0.6: 1(-0.635,0) 2(0.635,0)
  Top Layer region: 0.254,-0.508 0.762,-0.508 0.908,-0.479 1.031,-0.396 1.114,-0.273 1.143,-0.127 1.143,-0.127 1.143,0 1.104,0.194 0.994,0.359 0.829,0.469 0.635,0.508 0.635,0.508 0.254,0.508
  Top Layer region: -0.254,0.508 -0.762,0.508 -0.908,0.479 -1.031,0.396 -1.114,0.273 -1.143,0.127 -1.143,0.127 -1.143,0 -1.104,-0.194 -0.994,-0.359 -0.829,-0.469 -0.635,-0.508 -0.635,-0.508 -0.254,-0.508
  Top Layer lines w0.203: 0.635,-0.508 ccw(c0.635,0) 0.635,0.508 0.254,0.508 0.254,0 0.254,-0.508 0.635,-0.508 ; -0.254,-0.508 -0.635,-0.508 cw(c-0.635,0) -0.635,0.508 -0.254,0.508 -0.254,-0.508
DEBUG_B#13 [mm] "调试断点焊盘"
  round 0.6 smd paste-0.6: 1(-0.635,0) 2(0.635,0)
  Top Layer region: 0.254,-0.508 0.762,-0.508 0.908,-0.479 1.031,-0.396 1.114,-0.273 1.143,-0.127 1.143,-0.127 1.143,0 1.104,0.194 0.994,0.359 0.829,0.469 0.635,0.508 0.635,0.508 0.254,0.508
  Top Layer region: -0.254,0.508 -0.762,0.508 -0.908,0.479 -1.031,0.396 -1.114,0.273 -1.143,0.127 -1.143,0.127 -1.143,0 -1.104,-0.194 -0.994,-0.359 -0.829,-0.469 -0.635,-0.508 -0.635,-0.508 -0.254,-0.508
  Top Layer lines w0.203: -0.635,0.508 ccw(c-0.635,0) -0.635,-0.508 -0.254,-0.508 -0.254,0 -0.254,0.508 -0.635,0.508 ; 0.254,0.508 0.254,-0.508 0.635,-0.508 ccw(c0.635,0) 0.635,0.508 0.254,0.508
HDR2.54-LI-2x10P [mm] "双排排针，10x2脚"
  rect 1.6x1.6 hole 0.9: 1(-11.43,-1.27)
  round 1.6 hole 0.9: 2(-11.43,1.27) 3(-8.89,-1.27) 4(-8.89,1.27) 5(-6.35,-1.27) 6(-6.35,1.27) 7(-3.81,-1.27) 8(-3.81,1.27) 9(-1.27,-1.27) 10(-1.27,1.27) 11(1.27,-1.27) 12(1.27,1.27) 13(3.81,-1.27) 14(3.81,1.27) 15(6.35,-1.27) 16(6.35,1.27) 17(8.89,-1.27) 18(8.89,1.27) 19(11.43,-1.27) 20(11.43,1.27)
  silkscreen extent -12.7,-2.54 12.7,2.54, body extent -12.7,-2.54 12.7,2.54, height 8.5
HDR2.54-M-LI-4P [mm] "排母，4脚"
  round 1.7 hole 0.9: 1(-3.81,0) 2(-1.27,0) 3(1.27,0) 4(3.81,0)
  silkscreen extent -5.08,-1.27 5.08,1.27, body extent -5.08,-1.27 5.08,1.27, height 8.5
HDR2.54-M-LI-8P [mm] "排母，8脚"
  round 1.7 hole 0.9: 1(-8.89,0) 2(-6.35,0) 3(-3.81,0) 4(-1.27,0) 5(1.27,0) 6(3.81,0) 7(6.35,0) 8(8.89,0)
  silkscreen extent -10.16,-1.27 10.16,1.27, body extent -10.16,-1.27 10.16,1.27, height 8.5
ICO1 [mil]
  silkscreen extent -148,-111 156,187
IDC2.54-LI-2x5P [mm] "10P简易牛角座"
  rect 1.6x1.6 hole 0.9: 1(0,0)
  round 1.6 hole 0.9: 2(0,2.54) 3(2.54,0) 4(2.54,2.54) 5(5.08,0) 6(5.08,2.54) 7(7.62,0) 8(7.62,2.54) 9(10.16,0) 10(10.16,2.54)
  silkscreen extent -5.11,-3.23 15.27,6.1, body extent -5.08,-3.08 15.24,5.77, height 9.17
KF2510-LI-4P [mm] "接插件/2A"
  rect 1.8x1.8 hole 1: 1(-3.81,0)
  round 1.8 hole 1: 2(-1.27,0) 3(1.27,0) 4(3.81,0)
  silkscreen extent -5.08,-3.56 5.21,2.54, body extent -5.08,-3.5 5.08,2.4, height 11.05
KF2510-LI-8P [mm] "接插件/2A"
  rect 1.8x1.8 hole 1: 1(-8.89,0)
  round 1.8 hole 1: 2(-6.35,0) 3(-3.81,0) 4(-1.27,0) 5(1.27,0) 6(3.81,0) 7(6.35,0) 8(8.89,0)
  silkscreen extent -10.16,-3.56 10.16,2.54, body extent -10.16,-3.5 10.16,2.4, height 11.05
"R 0805_L" [mil] "1/8W贴片电阻   https://item.taobao.com/item.htm?ft=t&id=613637044352"
  rect 35x50 smd: 1(-37.4,0) 2(37.4,0)
  silkscreen extent -67,-36 67,36, body extent -39,-25 39,25, height 20
RCA-8P4R-0603#1 [mm] "3.2mm*1.6mm*0.6mm(长*宽*厚)"
  rect 0.65x0.9 smd: 1(-1.28,-0.8) 4(1.28,-0.8) 5(1.28,0.8) 8(-1.28,0.8)
  rect 0.5x0.9 smd: 2(-0.4,-0.8) 3(0.4,-0.8) 6(0.4,0.8) 7(-0.4,0.8)
  silkscreen extent -1.78,-1.4 1.78,1.4, body extent -1.6,-0.8 1.6,0.8, height 0.6
RCA-8P4R-0603#2 [mm] "3.2mm*1.6mm*0.6mm(长*宽*厚)"
  rect 0.65x0.9 smd: 1(-1.28,0.8) 4(1.28,0.8) 5(1.28,-0.8) 8(-1.28,-0.8)
  rect 0.5x0.9 smd: 2(-0.4,0.8) 3(0.4,0.8) 6(0.4,-0.8) 7(-0.4,-0.8)
  silkscreen extent -1.78,-1.4 1.78,1.4, body extent -1.6,-0.8 1.6,0.8, height 0.6
SMA [mm] "4.5x2.6*2.2mm（长宽高，不包括引脚）"
  rect 2.2x1.75 smd: 1(-2.3,0) 2(2.3,0)
  silkscreen extent -2.7,-1.52 3.56,1.52, body extent -2.53,-1.3 2.58,1.3, height 2.15
SOIC-14 [mm] "SOP, 14-Leads,"
  oval 2.2x0.6 smd: 1(-2.552,3.81) 2(-2.552,2.54) 3(-2.552,1.27) 4(-2.552,0) 5(-2.552,-1.27) 6(-2.552,-2.54) 7(-2.552,-3.81) 8(2.552,-3.81) 9(2.552,-2.54) 10(2.552,-1.27) 11(2.552,0) 12(2.552,1.27) 13(2.552,2.54) 14(2.552,3.81)
  silkscreen extent -2.55,-4.3 0.93,4.78, body extent -3,-4.35 2.99,4.35, height 1.55
SOP8_N [mm] "5*6*1.8mm（长宽高）淘宝ID:小糖豆的小窝窝"
  rect 1.8x0.55 smd: 1(-2.625,1.905)
  oval 1.8x0.55 smd: 2(-2.625,0.635) 3(-2.625,-0.635) 4(-2.625,-1.905) 5(2.625,-1.905) 6(2.625,-0.635) 7(2.625,0.635) 8(2.625,1.905)
  silkscreen extent -2.69,-2.5 1.52,3.2, body extent -3,-2.5 3,2.5, height 1.9
SOT23-3L [mm] "3x1.3x1mm(长宽高)"
  rect 0.45x1 smd: 1(-0.95,-1.143) 2(0.95,-1.143) 3(0,1.125)
  silkscreen extent -1.72,-1.65 1.5,0.7, body extent -1.5,-1.2 1.5,1.2, height 1.05
SOT23-6 [mm] "SOT-23/SC-74A; 5 Leads; Body 3.1 x 3 mm, inc. leads (LxW max)"
  rect 0.55x1.45 smd: 1(0.95,1.075) 2(0,1.075) 3(-0.95,1.075) 4(-0.95,-1.075) 5(0,-1.075) 6(0.95,-1.075)
  silkscreen extent -1.55,-0.9 1.73,1.88, body extent -1.43,-1.2 1.49,1.14, height 1
"TEST 1.8" [mm] "测试点1.8mm"
  round 1.8 smd paste-1.8: 1(0,0)
  silkscreen extent -1.15,-1.15 1.15,1.15
"TEST TP1.4_B" [mm] "蓝色，测试环"
  rect 1.7x1.7 hole 1: 1(0,0)
  silkscreen extent -1.78,-1.52 1.78,1.52, body extent -1.67,-1.4 1.67,1.4, height 5.41
"TSW SMD-3*6*4.3" [mm] "3*6*4.3mm"
  rect 2.5x1.5 smd: 1(-4.318,0) 2(4.318,0)
  silkscreen extent -3.21,-1.9 3.09,1.9, body extent -4.6,-1.75 4.6,1.75, height 4.4

## Part data
3V3 3V3 GND GND JP8 JP9 "POW in": library part "Header 4", "4P接插件", BOM名称=4P接插件, 下单链接=https://item.taobao.com/item.htm?ft=t&id=613637044352, 淘宝ID=小糖豆的小窝窝
3V3 GND GND VREF: "测试点", BOM名称=测试点, 下单链接=https://item.taobao.com/item.htm?ft=t&id=613637044352, 淘宝ID=小糖豆的小窝窝
C1 C2 C3 C4 C5 C6 C7 C8 C9 C10 C11 C12 C13 C14 C15 C16 C17 C18 C19 C20 C21 C22 C23 C24 C25 C26 C27 C28 C29 C30 C31 C32 C33 C34 C35 C36 C37 C38 C39 C40 C41 C42 C43 C44 C45 C46 C47 C48 C49 C50 C51 C52 C53 C54 C55: library part C, "贴片电容", BOM名称=贴片电容, 下单链接=https://item.taobao.com/item.htm?ft=t&id=613637044352, 淘宝ID=小糖豆的小窝窝
D1 D2: library part 1N4007, "整流二极管", BOM名称=整流二极管, 下单链接=https://item.taobao.com/item.htm?ft=t&id=613637044352, 淘宝ID=小糖豆的小窝窝
DE1 DE2 DE3 DE4 DE5 DE6 DE7 DE8 DE9 DE10 DE11 DE12 DE13 DE14 DE15 DE16 DE17 DE18 DE19 DE20 DE21 DE22 DE23 DE24 DE25 DE26 DE27 DE28 DE29 DE30 DE31 DE32 DE33 DE34 DE35 DE36 DE37 DE38 DE39 DE40 DE41 DE42 DE43 DE44 DE45 DE46 DE47 DE48 DE49 DE50 DE51 DE52 DE53 DE54 DE55 DE56 DE57 DE58 DE59 DE60 DE61 DE62 DE63 DE64 DE65 DE66 DE67 DE68 DE69 DE70 DE71 DE72 DE73 DE74 DE75 DE76 DE77 DE78 DE79 DE80 DE81 DE82 DE83 DE84 DE85 DE86 DE87 DE88 DE89 DE90 DE91 DE92 DE93 DE94 DE95 DE96 DE97 DE98 DE99 DE100 DE101 DE102 DE103 DE104 DE105 DE106 DE107 DE108 DE109 DE110 DE111 DE112 DE113 DE114 DE115 DE116 DE117 DE118 DE119 DE120 DE121 DE122 DE123 DE124 DE125 DE126 DE127: library part DEBUG, "调试断点焊盘", BOM名称=调试断点焊盘, 下单链接=https://item.taobao.com/item.htm?ft=t&id=613637044352, 淘宝ID=小糖豆的小窝窝
GND GND GND GND GND GND GND GND GND GND GND: "测试环", BOM名称=测试环, 下单链接=https://item.taobao.com/item.htm?ft=t&id=613637044352, 淘宝ID=小糖豆的小窝窝
J1 J2 J3 J4 J5 J6: "5*2P接插件", BOM名称=5*2P接插件, 下单链接=https://item.taobao.com/item.htm?ft=t&id=613637044352, 淘宝ID=小糖豆的小窝窝
J1-3 J4-2 J5-7 J8-6: library part "Header 10X2", "10*2P接插件", BOM名称=10*2P接插件, 下单链接=https://item.taobao.com/item.htm?ft=t&id=613637044352, 淘宝ID=小糖豆的小窝窝
JP1 JP2 JP3 JP4 JP5 JP6 JP7 JP10 JP11 JP12: library part "Header 8", "8P接插件", BOM名称=8P接插件, 下单链接=https://item.taobao.com/item.htm?ft=t&id=613637044352, 淘宝ID=小糖豆的小窝窝
L1 L2: library part L-CDRH, "功率屏蔽电感", BOM名称=功率屏蔽电感, 下单链接=https://item.taobao.com/item.htm?ft=t&id=613637044352, 淘宝ID=小糖豆的小窝窝
R1 R2 R3 R8 R9 R10 R11 R12 R13 R14 R15 R16 R17 R18 R19 R20 R21 R22 R23 R24 R25 R26 R27 R28 R29 R30 R31 R32 R33 R34 R35 R36 R37 R38 R39 R40 R41 R42 R43 R44 R45 R46 R47 R48 R49 R50 R51 R52 R53 R54 R55 R56 R57 R58 R59 R60 R61 R62 R63 R64 R65 R66 R67 R68 R69 R70 R71 R72 R73 R80 R81 R82 R83 R84 R85 R86 R87 R88 R89 R90 R91 R92 R93 R94 R95 R96 R97 R98 R99 R100 R101 R102 R103 R104 R105 R106 R107 R108 R109 R110 R111: library part R, "贴片电阻", BOM名称=贴片电阻, 下单链接=https://item.taobao.com/item.htm?ft=t&id=613637044352, 淘宝ID=小糖豆的小窝窝
R4 R5 R6 R7 R74 R75 R76 R77 R78 R79: library part R-8P4R, "贴片排阻", BOM名称=贴片排阻, 下单链接=https://item.taobao.com/item.htm?ft=t&id=613637044352, 淘宝ID=小糖豆的小窝窝
RP1 RP2 RP3 RP4 RP5 RP6 RP7 RP8 RP9 RP10 RP11 RP12 RP13 RP14 RP15 RP16: library part RP-SMD, "贴片电位器", BOM名称=贴片电位器, 下单链接=https://item.taobao.com/item.htm?ft=t&id=613637044352, 淘宝ID=小糖豆的小窝窝
SW1 SW2 SW3 SW4 SW5 SW6 SW7 SW8: library part "TSW 3x6", "3x6轻触开关", BOM名称=3x6轻触开关, 下单链接=https://item.taobao.com/item.htm?ft=t&id=613637044352, 淘宝ID=小糖豆的小窝窝
SW9: "1路编码开关", BOM名称=1路编码开关, 下单链接=https://item.taobao.com/item.htm?ft=t&id=613637044352, 淘宝ID=小糖豆的小窝窝
U7: library part SCT2330
U18 U19 U20 U21 U22 U23 U24 U25: "4路运放", Alias1=https://item.taobao.com/item.htm?ft=t&id=613637044352, BOM名称=4路运放, 淘宝ID=小糖豆的小窝窝

## Free pads (board coordinates)
  round 196.85 hole 125.98: Q(-5020.22,-3980.71) Q(-5020.22,231.89) Q(-2165.89,231.89) Q(-2165.89,-3980.71) Q(407.88,-1882.79) Q(2656.94,-3980.71) Q(2656.94,231.89)

## Via types
v1: diameter 15, hole 12, Top Layer to Bottom Layer, 457 vias

## Nets (pads, with @x,y where several pads share a name; then routed paths per layer and width w, separated by ;. In a path a pad name is that pad's centre, name@x,y a point inside that pad or via, vN(x,y) a via of type N, cw(c..) or ccw(c..) an arc to the next point about the centre after c; other vN are vias at no path point)
3V3: 3V3.1 3V3.2 3V3.3 3V3.4 C7.2 C8.2 C9.2 C10.2 J1-3.1 J5-7.1 JP7.2 JP8.1 JP9.2 JP10.6 L2.2 R72.2 R73.2 R74.1 R74.2 R74.3 R74.4 R75.1 R75.2 R75.3 R75.4 SW9.1 U1.2 U2.2 U3.2 U4.2 U5.2 U6.2 U8.2 U9.2 U10.2 U11.2 U12.2 U13.2 U14.2 U15.2 U16.2 U17.2 | length 16251.4
  Top Layer w25: JP9.2@-4828.74,-200 JP8.1@-4928.74,-300 -4928.74,-309.59 -4249.57,-988.77 -1649.57,-988.77 -1068.33,-1570 v1(-788.74,-1570) v1(-688.74,-1570) v1(-588.74,-1570) v1(-488.74,-1570) v1(-388.74,-1570) v1(-288.74,-1570) v1(-188.74,-1570) v1(-88.74,-1570) -28.42,-1570 -23.42,-1565 ; JP9.2@-4820.72,-200 -4745.72,-125 ; v1(-4568.74,75) -4568.74,-123.82 -4744.54,-123.82 -4745.72,-125 ; JP10.6@-3978.74,-25 -3978.74,-125 ; 3V3.4@-3268.32,-188.18 3V3.3@-3268.26,-86.22 ; 3V3.1@-3268.32,110 3V3.2@-3268.26,13.78 3V3.3@-3268.26,-86.22 ; J5-7.1@53,-1203.54 72,-1222.54 97.76,-1222.54 128.6,-1253.38 128.6,-1412.98 -23.42,-1565 ; 225.76,-2175.76 -23.42,-1926.58 -23.42,-1565 ; 3V3.1@732.1,-2203.06 3V3.1@734.88,-2205.83 ; 3V3.1@737.55,-2205.75 1373.3,-1570 v1(1711.26,-1570) v1(1811.26,-1570) v1(1911.26,-1570) v1(2011.26,-1570) v1(2111.26,-1570) v1(2211.26,-1570) v1(2311.26,-1570) v1(2411.26,-1570) 2471.58,-1570 2620.96,-1420.63 2620.96,-1254.64 2588.86,-1222.54 2572,-1222.54 J1-3.1@2553,-1203.54 ; 835.83,-2205.83 1599.74,-2205.83 1891.5,-2497.59 1896.42,-2497.59 1899.21,-2500.39 R75.4@1899.21,-2505.31 R75.3@1933.86,-2505.31 R75.2@1965.35,-2505.31 R75.1@2000,-2505.31 R74.4@2100,-2505.31 R74.3@2134.65,-2505.31 R74.2@2166.14,-2505.31 R74.1@2200.79,-2505.31 ; -4745.72,-125 -4568.74,-125 -3978.74,-125 ; -3978.74,-125 -3625,-125 SW9.1@-3620,-130 -3324.45,-130 -3280.67,-86.22 3V3.3@-3268.26,-86.22
  Top Layer w40: 3V3.4@-713.33,-3848.82 3V3.3@-613.33,-3848.82 3V3.2@-513.33,-3848.82 3V3.1@-413.33,-3848.82 -308.82,-3848.82 900,-2640 900,-2270 835.83,-2205.83 3V3.1@734.88,-2205.83
  Bottom Layer w25: R72.2@-4728.74,74.8 R73.2@-4628.74,74.8 v1@-4568.94,74.8 ; v1(-4568.74,75) -4568.74,130.36 -4554.1,145 -4393.38,145 -4378.74,130.36 JP7.2@-4378.74,75
14: JP12.8 R79.4 U25.12 | length 1564.7
  inner signal w10: JP12.8@-3035.58,-2550 -2985.58,-2600 -2310.58,-2600 -2160.58,-2750 -2160.58,-3028.99 v1(-2114.09,-3075.48)
  Bottom Layer w10: R79.4@-3234.79,-2400 -3184.79,-2400 JP12.8@-3034.79,-2550
15: JP11.8 R77.4 U21.12 | length 1564.7
  inner signal w10: JP11.8@-3035.58,-1200 -2985.58,-1250 -2310.58,-1250 -2160.58,-1400 -2160.58,-1678.99 v1(-2114.09,-1725.48)
  Bottom Layer w10: R77.4@-3234.79,-1050 -3184.79,-1050 JP11.8@-3034.79,-1200
+5: "POW in.2" D1.1 D2.1 | length 915.1
  Top Layer w30: D2.1@-1340,-3170 D1.1@-1150,-3170 -1150,-3178.86 -1038.33,-3290.52 -1038.33,-3848.82
+12: "POW in.1" DE82.2 DE98.2 DE99.2 DE100.2 DE105.2 DE106.2 DE107.2 DE108.2 | length 11546.3
  Top Layer w20: v1(-4740,-2800) -4720,-2800 DE105.2@-4700,-2800 ; v1(-4740,-1450) -4720,-1450 ; v1(-3940,-2800) -3920,-2800 ; v1(-3940,-1450) -3920,-1450 ; v1(-3140,-2800) -3120,-2800 ; v1(-3140,-1450) -3120,-1450 ; v1(-2340,-2800) -2320,-2800 ; v1(-2340,-1450) -2320,-1450
  Bottom Layer w20: v1(-2340,-2800) v1(-3140,-2800) v1(-3940,-2800) v1(-4740,-2800) -4933.76,-2800 ; v1(-2340,-1450) -4875,-1450 -4933.76,-1508.76 -4933.76,-2800 ; -925,-3850 -1076.18,-3698.82 -4751.18,-3698.82 -4933.76,-3516.24 -4933.76,-2800